# Altium PCB ASCII-v1.2.PcbDoc (part 1 of 4)
Units mil, origin at the board's own origin, x right, y up, seen from the top; angles counter-clockwise.
Board outline 1968.5 x 4921.26 mil, 4 copper layers (Top Layer, Layer 1, Layer 2, Bottom Layer), stack 62.45 mil thick; 189 components, 115 nets, 824 pads, 260 vias.
Unrouted connection lines stored in the file: 139.
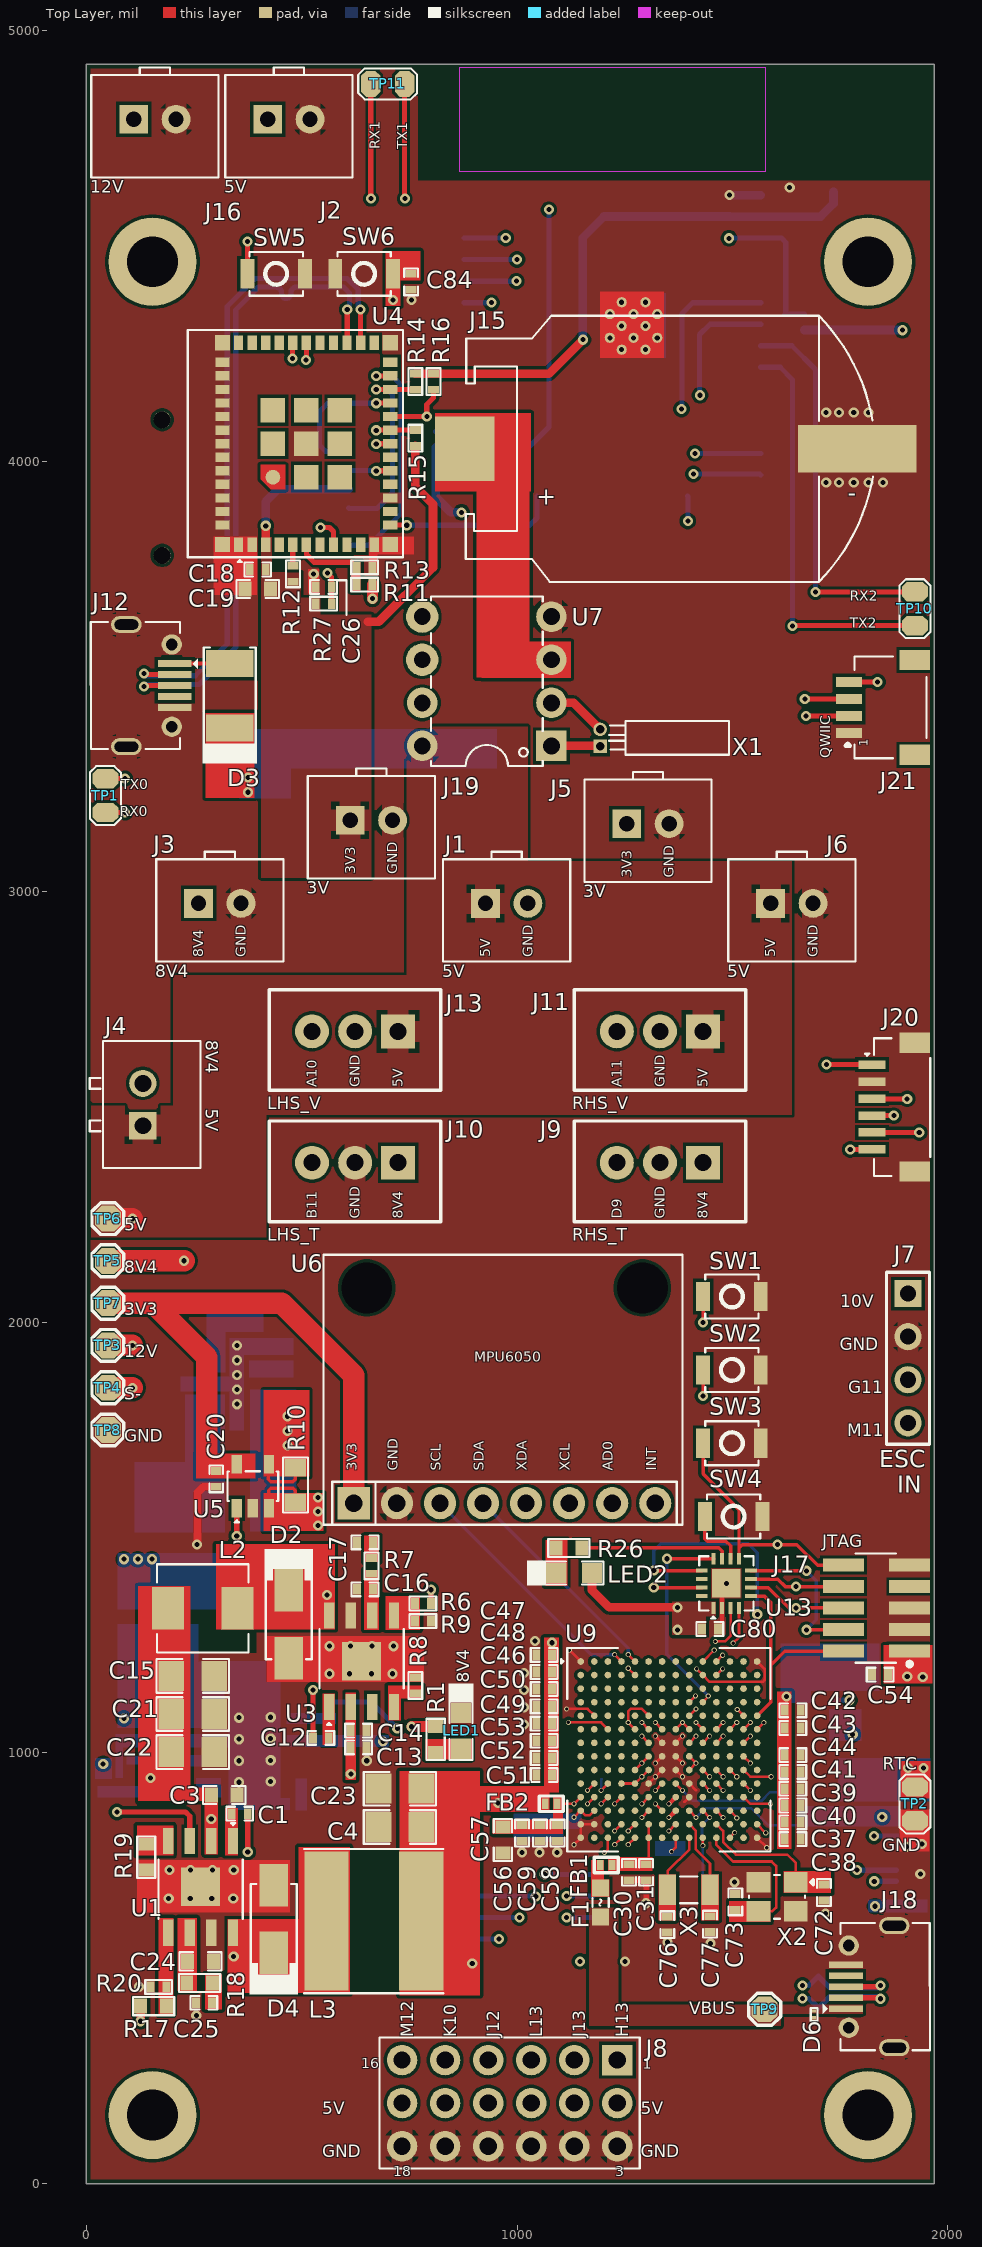
[diagram p0: Top Layer view]
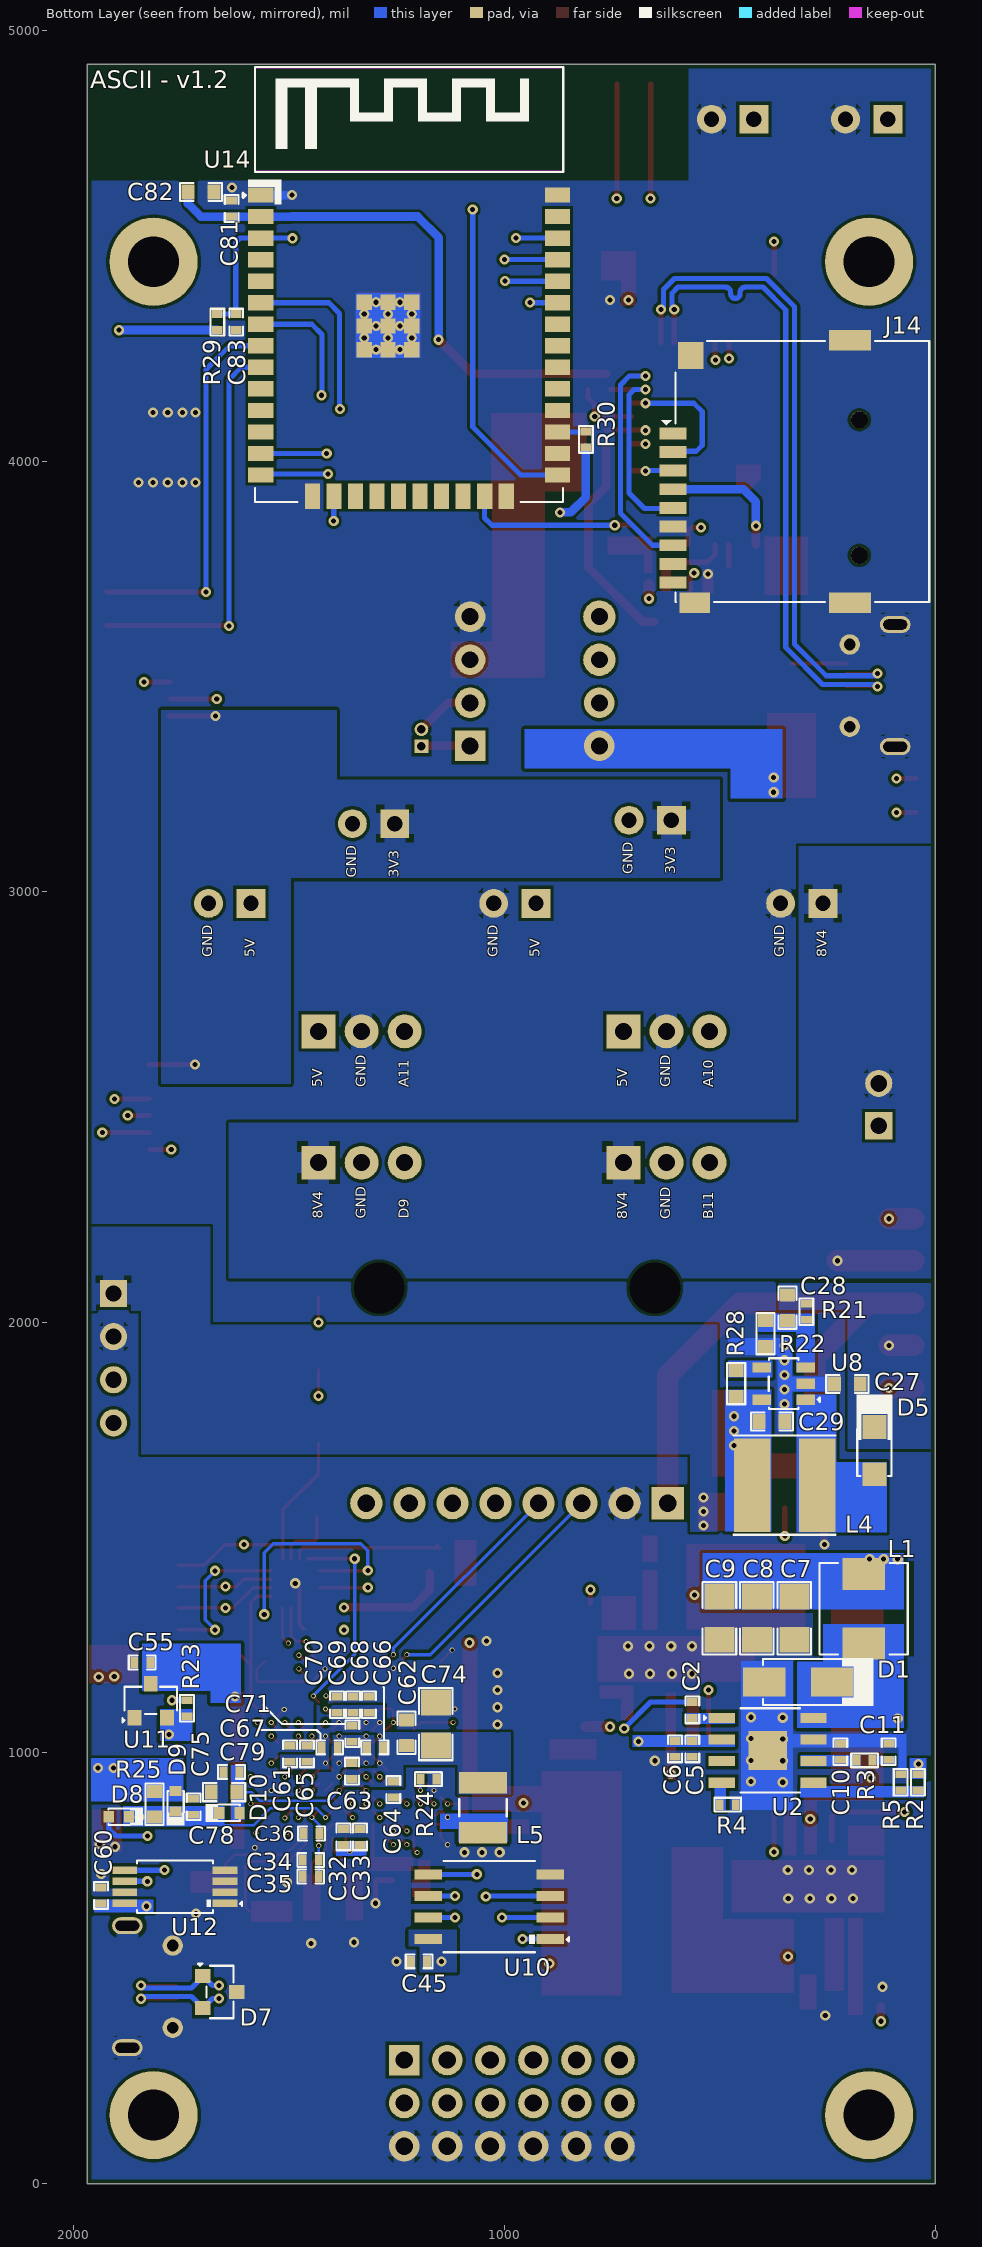
[diagram p1: Bottom Layer view, seen from below]
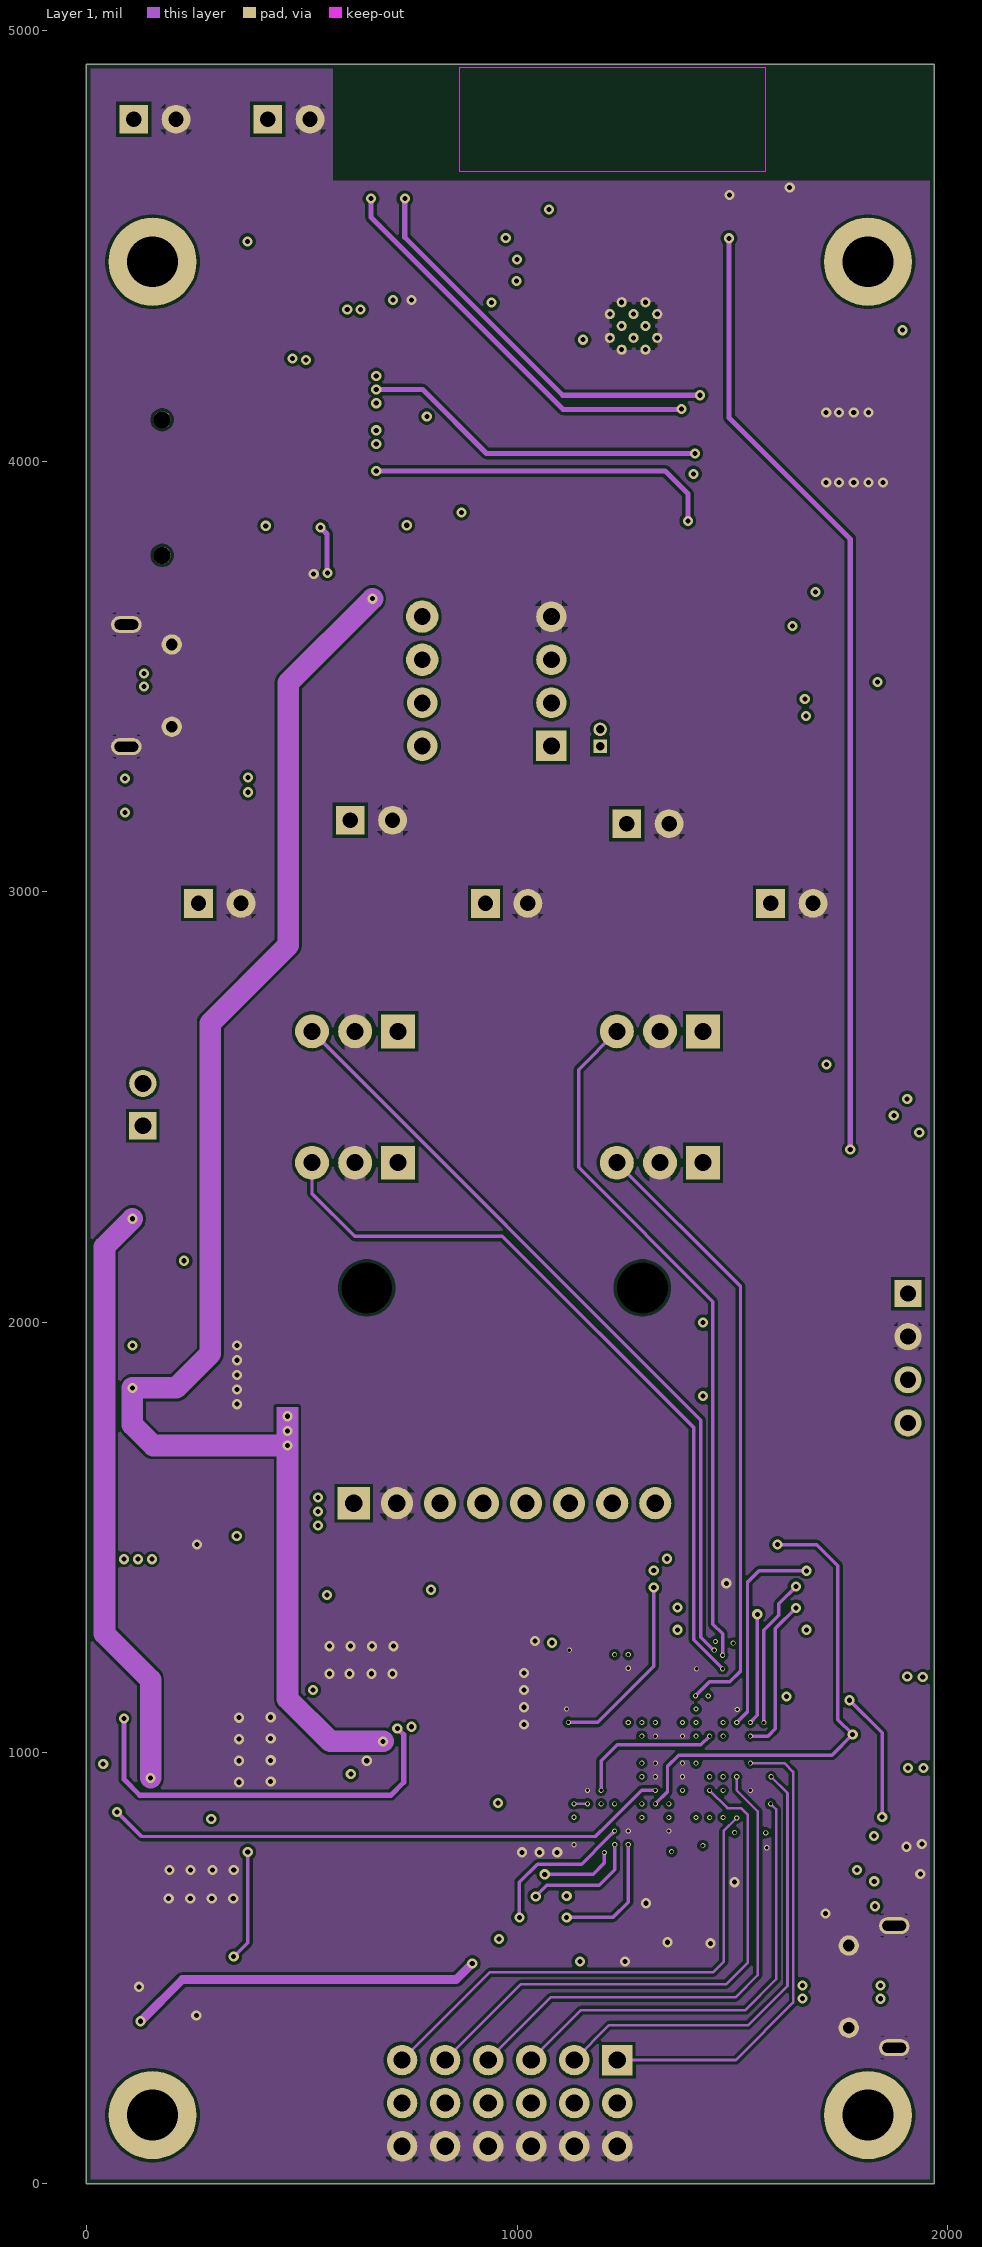
[diagram p2: Layer 1]
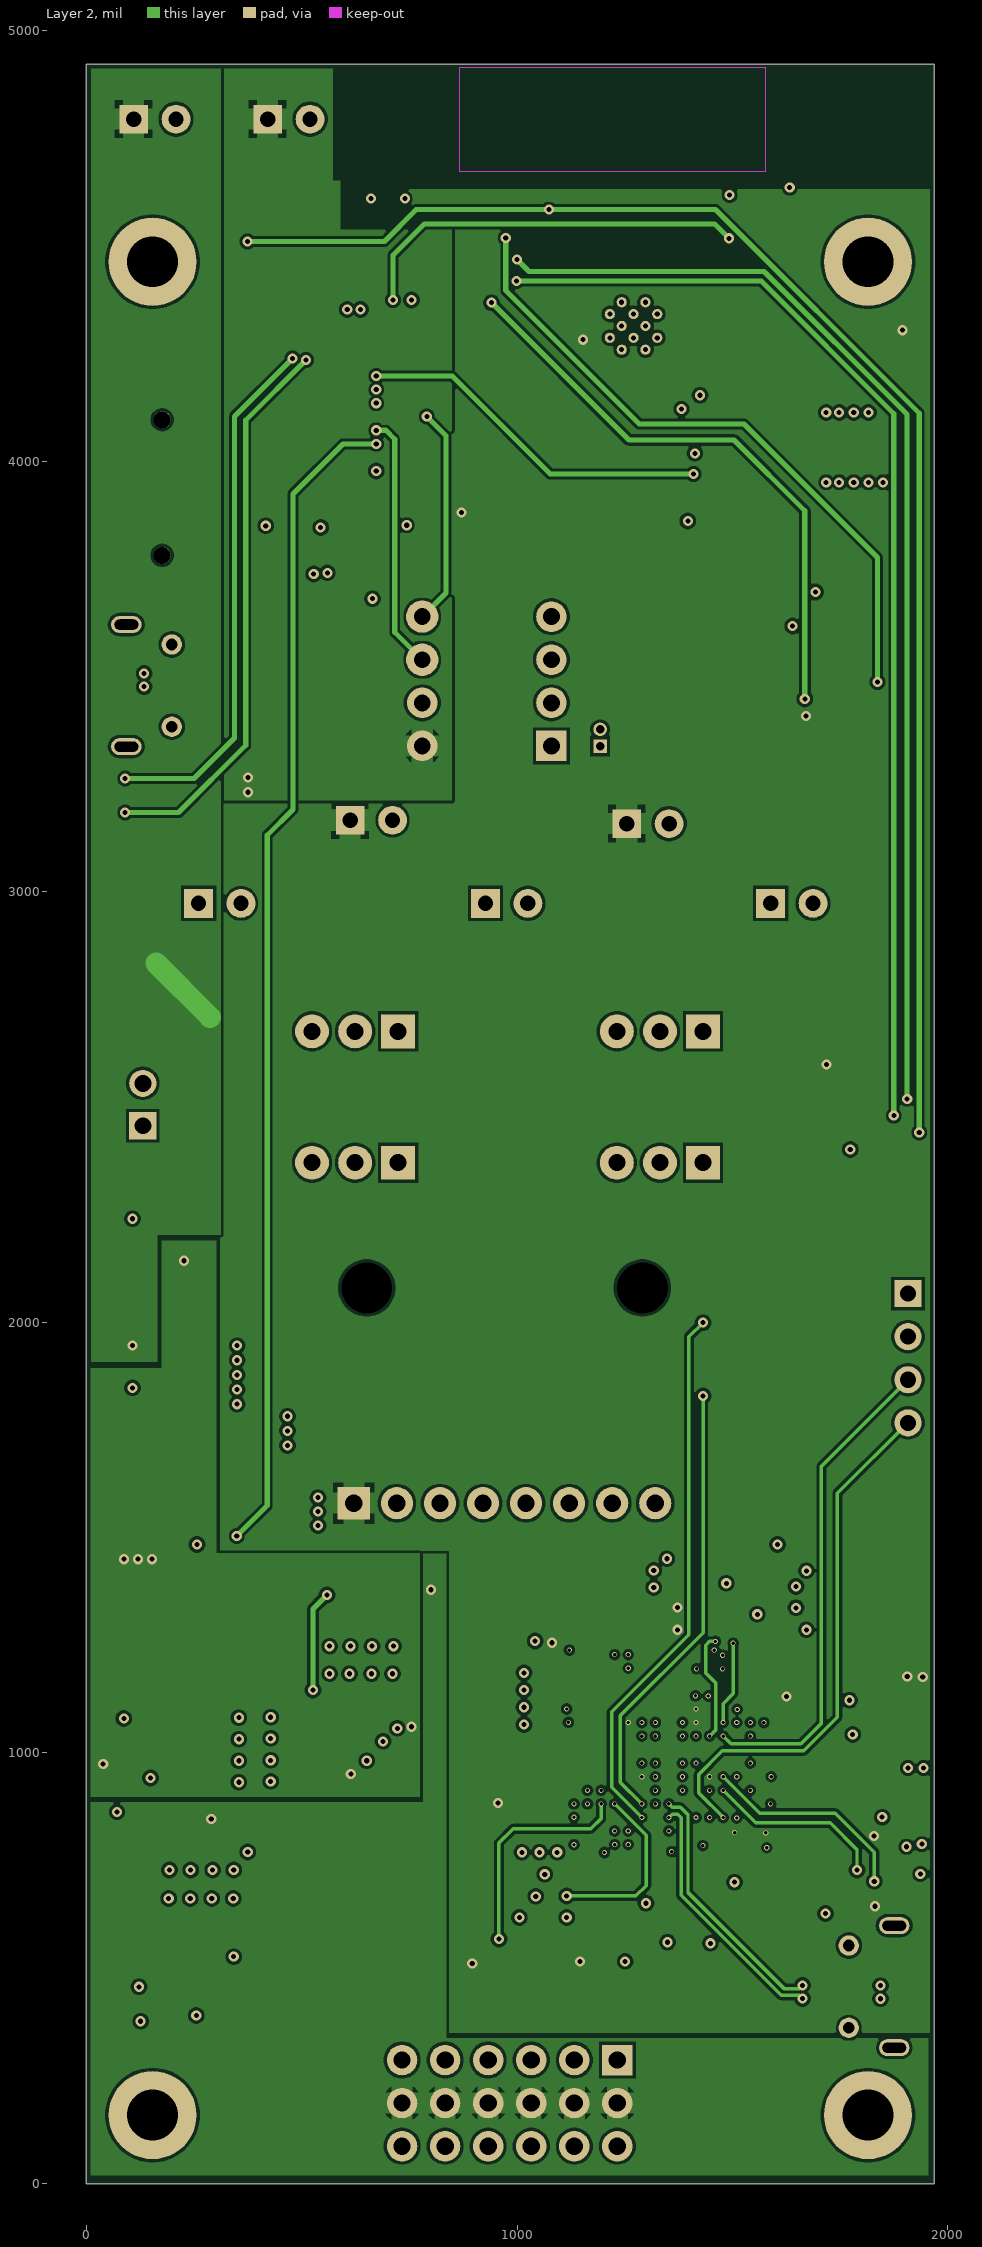
[diagram p3: Layer 2]
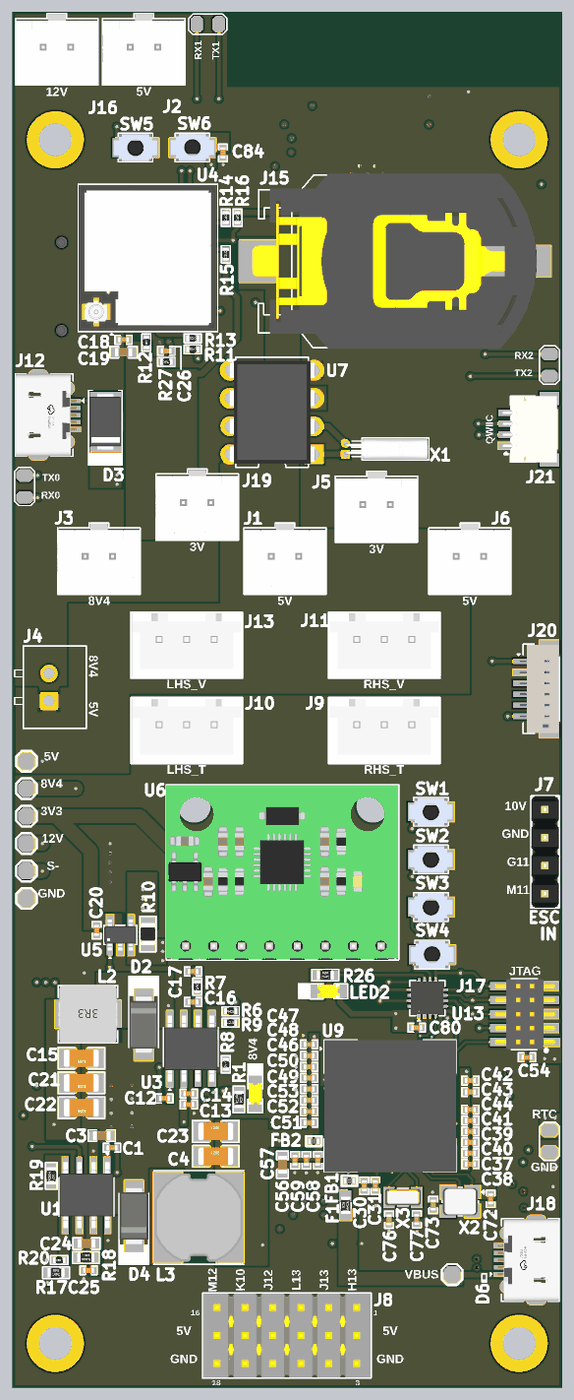
[diagram p5: 3D render of the assembled board from above, using the file's embedded part models]
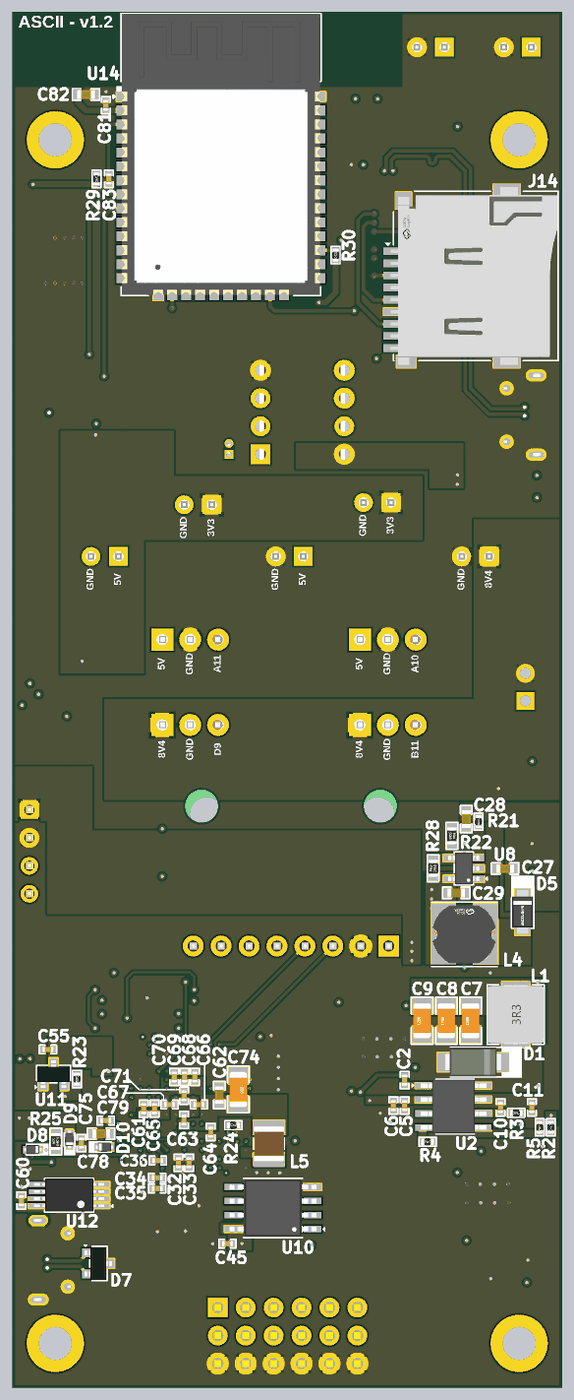
[diagram p6: 3D render of the assembled board from below, using the file's embedded part models]

## Layer stack, top to bottom
Top Solder: solder mask 0.394, Solder Resist, Dk 3.5
Top Layer: signal copper 1.38
Dielectric 2: prepreg 8.28, PP-006, Dk 4.1
Layer 1: signal copper 0.6
Dielectric 1: core 41.93, FR-4, Dk 4.8
Layer 2: signal copper 0.6
Dielectric 3: prepreg 8.28, PP-006, Dk 4.1
Bottom Layer: signal copper 1.38
Bottom Solder: solder mask 0.394, Solder Resist, Dk 3.5

## Board outline
0,0 0,4921.26 1968.5,4921.26 1968.5,0

## Design rules (kind name [scope] priority, off if disabled: settings)
BoardOutlineClearance [All] p1: gap=0 ignorepadtopadclearanceinfootprint=FALSE except(10: Poly-OutlineEdge)
Clearance [All] p1: gap=7 ignorepadtopadclearanceinfootprint=FALSE except(0: Arc-Hole Track-Hole SMDPad-Hole THPad-Hole Via-Hole Fill-Hole Poly-Hole Region-Hole Text-Hole; 4: Arc-SMDPad Track-SMDPad SMDPad-SMDPad)
DiffPairsRouting [InDifferentialPairClass('USB_PROGRAM_LINES')] p1: maxlimit=8 minlimit=8 mostfreqgap=8 toplayer_minwidth=12 toplayer_maxwidth=12 toplayer_prefwidth=12 midlayer1_minwidth=8 midlayer1_maxwidth=8 midlayer1_prefwidth=8 midlayer2_minwidth=8 midlayer2_maxwidth=8 midlayer2_prefwidth=8 bottomlayer_minwidth=12 bottomlayer_maxwidth=12 bottomlayer_prefwidth=12 impedanceprofiledriven=TRUE impedanceprofileid={82D3349C-C058-4513-A408-416EB23D566D} impedanceprofilevalue=90.000000 maxuncoupledlength=500
HoleSize [All] p1: absolutevalues=TRUE maxlimit=1000 minlimit=1 maxpercent=80.000 minpercent=20.000
HoleToHoleClearance [All] p1: gap=0 allowstackedmicrovias=TRUE
MatchedLengths "Schematic Matched Net Lengths" [InNetClass('USB_PROGRAM')] p1: tolerance=50 checknetsindiffpair=TRUE checkdiffpairvsdiffpair=FALSE checkxsignals=FALSE checkothers=FALSE
MaxMinImpedance "Schematic Impedance Constraint" [InNetClass('USB_PROGRAM')] p1: minimum=85.00 maximum=90.00
MinimumSolderMaskSliver [All] p1: minsoldermaskwidth=0
PolygonConnect [All] p1: thpad.connectstyle=Relief thpad.reliefconductorwidth=50 thpad.reliefentries=4 thpad.polygonreliefangle="90 Angle" thpad.airgapwidth=10 smdpad.connectstyle=Direct smdpad.reliefconductorwidth=50 smdpad.reliefentries=4 smdpad.polygonreliefangle="90 Angle" smdpad.airgapwidth=10 via.connectstyle=Direct via.reliefconductorwidth=50 via.reliefentries=4 via.polygonreliefangle="90 Angle" via.airgapwidth=10
RoutingVias [All] p1: holewidth=11.81 width=23.62 viastyle="Through Hole" minholewidth=7.87 minwidth=11.81 maxholewidth=11.81 maxwidth=23.62
SilkToSilkClearance [All] p1: silktosilkclearance=0
SilkToSolderMaskClearance [IsPad] p1: minsilkscreentomaskgap=0 clearancetoexposedcopper=TRUE
SolderMaskExpansion [All] p1: expansion=4 istentingtop=FALSE
UnRoutedNet [All] p1: checkbadconnections=TRUE
Width [All] p1: maxlimit=100 minlimit=6 preferedwidth=22
23 further rules are at their usual default settings.

## Classes and differential pairs
component class U_Teensy_4.1_Section: C30 C31 C32 C33 C34 C35 C36 C37 C38 C39 C40 C41 C42 C43 C44 C45 C46 C47 C48 C49 C50 C51 C52 C53 C54 C55 C56 C57 C58 C59 C60 C61 C62 C63 C64 C65 C66 C67 C68 C69 C70 C71 C72 C73 C74 C75 C76 C77 C78 C79 C80 D6 D7 D8 D9 D10 F1 FB1 FB2 J17 J18 L5 LED2 P7 R23 R24 R25 R26 SW1 SW2 SW3 SW4 TP2 TP9 U9 U10 U11 U12 U13 X2 X3
differential pair class USB_PROGRAM_LINES: USB1_D USB_D
net class USB_PROGRAM: USB1_D_N USB1_D_P USB_D_N USB_D_P
component class U_Power_Section: C1 C2 C3 C4 C5 C6 C7 C8 C9 C10 C11 C12 C13 C14 C15 C16 C17 C21 C22 C23 C24 C25 C27 C28 C29 D1 D2 D4 D5 J1 J2 J3 J4 J5 J6 J16 J19 L1 L2 L3 L4 LED1 R1 R2 R3 R4 R5 R6 R7 R8 R9 R17 R18 R19 R20 R21 R22 R28 TP3 TP4 TP5 TP6 TP7 TP8 U1 U2 U3 U8
component class U_Controller_Section: C18 C19 C20 C26 C81 C82 C83 C84 D3 J7 J8 J9 J10 J11 J12 J13 J14 J15 J20 J21 R10 R11 R12 R13 R14 R15 R16 R27 R29 R30 SW5 SW6 TP1 TP10 TP11 U4 U5 U6 U7 U14 X1
differential pair USB1_D: +USB1_D_P -USB1_D_N
differential pair USB_D: +USB_D_P -USB_D_N

## Components (designator, comment, footprint, x,y, rotation, side; value= is the part's Value field where it differs from the comment)
C1 "0.1uF" Cap-0402 356.11,859.12 r180 top
C2 "0.1uF" Cap-0402 564,1100 r270 bottom
C3 "10uF" Cap-0603 320.11,902.12 r180 top
C4 "47uF" Cap-1206 728.11,828.12 r0 top
C5 "4.7uF" Cap-0402 564,1009.5 r90 bottom
C6 "4.7uF" Cap-0402 604,1009.5 r90 bottom
C7 "47uF" Cap-1206 327,1313 r90 bottom
C8 "47uF" Cap-1206 414,1313 r90 bottom
C9 "47uF" Cap-1206 501,1313 r90 bottom
C10 "6.8pF" Cap-0402 220,1003 r270 bottom
C11 "5.6nF" Cap-0402 108,1003 r270 bottom
C12 "0.1uF" Cap-0402 544.5,1035 r0 top
C13 "4.7uF" Cap-0402 632,1013 r180 top
C14 "4.7uF" Cap-0402 632,1052 r180 top
C15 "47uF" Cap-1206 247,1179 r180 top
C16 "8.2pF" Cap-0402 647,1380 r0 top
C17 "1.8nF" Cap-0402 647,1489 r0 top
C18 "0.1uF" Cap-0402 397.88,3748.23 r180 top
C19 "10uF" Cap-0603 397.88,3703.23 r180 top
C20 "0.1uF" Cap-0402 301.5,1636.5 r90 top
C21 "47uF" Cap-1206 247,1090.5 r180 top
C22 "47uF" Cap-1206 247,1002 r180 top
C23 "47uF" Cap-1206 728.11,917.12 r0 top
C24 "18pF" Cap-0603 265.11,516.12 r180 top
C25 "1.8nF" Cap-0402 273,420 r0 top
C26 "1uF" Cap-0402 551,3708 r0 top
C27 "10uF" Cap-0603 204,1857 r180 bottom
C28 "470pF" Cap-0603 343,2034 r90 bottom
C29 "10uF" Cap-0603 379,1770 r0 bottom
C30 "1uF" Cap-0402 1260,723.02 r90 top
C31 "1uF" Cap-0402 1300,723.02 r90 top
C32 "4.7uF" Cap-0402 1374,805.02 r270 bottom
C33 "0.22uF" Cap-0402 1336,805.02 r270 bottom
C34 "4.7uF" Cap-0402 1450,751.01 r180 bottom
C35 "0.22uF" Cap-0402 1450,713.01 r180 bottom
C36 "0.22uF" Cap-0402 1448,813.01 r180 bottom
C37 "4.7uF" Cap-0402 1640.5,839.02 r180 top
C38 "0.22uF" Cap-0402 1640.5,800.02 r180 top
C39 "0.22uF" Cap-0402 1640.5,917.02 r180 top
C40 "1uF" Cap-0402 1640.5,878.02 r180 top
C41 "4.7uF" Cap-0402 1640.5,956.02 r180 top
C42 "100nF" cap-0402 1640.5,1099.02 r180 top
C43 "100nF" cap-0402 1640.5,1058.02 r180 top
C44 "100nF" cap-0402 1640.5,995.02 r180 top
C45 "100nF" cap-0402 1198.5,516 r180 bottom
C46 "4.7uF" Cap-0402 1063,1148.15 r0 top
C47 "100nF" cap-0402 1063,1228.01 r0 top
C48 "100nF" cap-0402 1063,1188.08 r0 top
C49 "4.7uF" Cap-0402 1063,1068.29 r0 top
C50 "100nF" cap-0402 1063,1108.22 r0 top
C51 "4.7uF" Cap-0402 1063,948.5 r0 top
C52 "100nF" cap-0402 1063,988.43 r0 top
C53 "0.22uF" Cap-0402 1063,1028.36 r0 top
C54 "100nF" cap-0402 1843,1182.01 r0 top
C55 "100nF" cap-0402 1841.5,1210.01 r180 bottom
C56 "4.7uF" Cap-0402 1012,814.02 r90 top
C57 "22uF" Cap-0603 967,798.02 r90 top
C58 "0.22uF" Cap-0402 1094,814.02 r90 top
C59 "0.22uF" Cap-0402 1053,814.02 r90 top
C60 "100nF" cap-0402 1936.82,669.33 r270 bottom
C61 "4.7uF" Cap-0402 1498,998.02 r270 bottom
C62 "22uF" Cap-0603 1227.5,1047.01 r270 bottom
C63 "0.22uF" Cap-0402 1354,958.02 r270 bottom
C64 "0.22uF" Cap-0402 1258,915.02 r90 bottom
C65 "0.22uF" Cap-0402 1459,998.02 r270 bottom
C66 "0.22uF" Cap-0402 1301,1013.02 r180 bottom
C67 "0.22uF" Cap-0402 1406,1013.02 r0 bottom
C68 "0.22uF" Cap-0402 1315,1112.02 r270 bottom
C69 "0.22uF" Cap-0402 1352,1112.02 r270 bottom
C70 "0.22uF" Cap-0402 1389,1112.02 r270 bottom
C71 "0.22uF" Cap-0402 1353.5,1044.51 r90 bottom
C72 "12pF" Cap-0402 1712.71,675.98 r270 top
C73 "12pF" Cap-0402 1507,654.05 r90 top
C74 "33uF" Cap-1206 1159.5,1067.01 r270 bottom
C75 "0.22uF" Cap-0402 1722,875.02 r270 bottom
C76 "12pF" Cap-0402 1349,601.52 r270 top
C77 "12pF" Cap-0402 1448.21,602.52 r270 top
C78 "10uF" Cap-0603 1651,909.02 r180 bottom
C79 "0.22uF" Cap-0402 1634,956.02 r180 bottom
C80 "100nF" cap-0402 1448,1288 r180 top
C81 "0.1uF" Cap-0402 1633.86,4586.61 r90 bottom
C82 "10uF" Cap-0603 1705,4625 r180 bottom
C83 "0.1uF" Cap-0402 1623,4323 r90 bottom
C84 "0.1uF" Cap-0402 754,4416.32 r90 top
D1 "SS56" SMA 318.26,1165 r0 bottom
D2 "SS56" SMA 470,1298.74 r270 top
D3 "SS34-MS" SMA(DO-214AC) 333,3455.2 r90 top
D4 "SS56" SMA 435.11,614.38 r90 top
D5 "PMEG3010ER,115" SOD-123W 141,1702.12 r90 bottom
D6 "PESD5V0H1BSFYL" DSN0603-2 1690,392.87 r90 top
D7 "ESD5302F-3/TR" Sot-23 1661,445 r270 bottom
D8 "RB521S30T1G" SOD-523 1895.62,852.02 r180 bottom
D9 "RB521S30T1G" SOD-523 1764,888.02 r270 bottom
D10 "RB521S30T1G" SOD-523 1638.93,861.02 r0 bottom
F1 "SMD0603-050" Fuse-0603 1194,652.55 r90 top
FB1 "BLM15PD121SN1D" IND-0402 1207,740.02 r0 top
FB2 "BLM15PD121SN1D" IND-0402 1079.22,882.02 r0 top
J1 "2.54-2P ZZDK" "2.54-2P ZZDK" 976,2973 r0 top
J2 "2.54-2P ZZDK" "2.54-2P ZZDK" 470.21,4794 r0 top
J3 "2.54-2P ZZDK" "2.54-2P ZZDK" 309.79,2973 r0 top
J4 "B2B-XH-2(LF)(SN)" B2B-XH-2(LF)(SN) 131,2505.79 r90 top
J5 "2.54-2P ZZDK" "2.54-2P ZZDK" 1304,3158 r0 top
J6 "2.54-2P ZZDK" "2.54-2P ZZDK" 1638.21,2973 r0 top
J7 "X6511WV-04H-C60D30" HDR1X4_ 1907.92,2066.7 r270 top
J8 "TSW-106-07-T-T" TSW-106-07-T-T 983,187 r180 top
J9 "B3B-XH-A(LF)(SN)" B3B-XH-A(LF)(SN)_ 1281.91,2370.7 r180 top
J10 "B3B-XH-A(LF)(SN)" B3B-XH-A(LF)(SN)_ 573.92,2370.7 r180 top
J11 "B3B-XH-A(LF)(SN)" B3B-XH-A(LF)(SN)_ 1281.91,2675.7 r180 top
J12 "HX MICRO XNJ JB" "HX MICRO XNJ JB" 149,3478.75 r270 top
J13 "B3B-XH-A(LF)(SN)" B3B-XH-A(LF)(SN)_ 573.92,2675.7 r180 top
J14 "HX TF-CARD H1.8" "HX TF-CARD H1.8" 392.54,3975.92 r90 bottom
J15 "BS-CR2032-8" BS-CR2032-8 1334.29,4028.69 r180 top
J16 "2.54-2P ZZDK" "2.54-2P ZZDK" 159,4794 r0 top
J17 "20021121-00010C4LF" 20021121-00010C4LF_ 1834.73,1336.51 r90 top
J18 "HX MICRO XNJ JB" "HX MICRO XNJ JB" 1819.8,457.27 r90 top
J19 "2.54-2P ZZDK" "2.54-2P ZZDK" 661.79,3166 r0 top
J20 "Voltlink Target" "Voltlink Target" 1874,2500 r270 top
J21 "SM04B-SRSS-TB(LF)(SN)" SM04B-SRSS-TB(LF)(SN) 1847,3428 r90 top
L1 "2.2uH" PSPMAA0503-2R2M-ANP 166,1335 r90 bottom
L2 "2.2uH" PSPMAA0503-2R2M-ANP 270.39,1336 r180 top
L3 "1uH" SRN8040-1R0Y 667.34,609.45 r0 top
L4 "12uH" SMTDR54-120M 349.21,1622 r180 bottom
L5 "4.7uH" IND-1210 1050,873.02 r270 bottom
LED1 "150080BS75000" LED-0805 870,1051.34 r90 top
LED2 "Orange" LED-0805 1132.66,1418 r180 top
R1 "270R" Res-0603 811,1031.34 r90 top
R2 "115K" Res-0402 40,932 r90 bottom
R3 "28.7K" Res-0402 164,983 r180 bottom
R4 "105K" Res-0402 481.5,880 r0 bottom
R5 "12.1k" Res-0402 80,932 r270 bottom
R6 "60.4K" Res-0402 781.5,1347 r0 top
R7 "23.7K" Res-0402 662,1434.5 r270 top
R8 "80.6K" Res-0402 764,1157 r270 top
R9 "11.5K" Res-0402 781.5,1306 r180 top
R10 "6mR" RES-0805 485.5,1622.5 r270 top
R11 "10K" Res-0402 645.88,3713.23 r180 top
R12 "10K" Res-0402 479.88,3738.23 r90 top
R13 "2K" Res-0402 645.88,3753.23 r180 top
R14 "10K" Res-0402 764,4184.5 r90 top
R15 "10K" Res-0402 764,4053.48 r270 top
R16 "10K" Res-0402 806,4184.5 r90 top
R17 "36.5K" Res-0603 156,412 r180 top
R18 "15.4K" Res-0603 263,466 r180 top
R19 "75K" Res-0603 139,758 r90 top value=75kR
R20 "11.5K" Res-0402 167.5,457 r0 top
R21 "118K" Res-0402 299,2024.5 r90 bottom
R22 "13.3K" Res-0603 394,1974 r90 bottom
R23 "100K" Res-0402 1737.5,1104.01 r270 bottom
R24 "100K" Res-0402 1176.77,939.02 r0 bottom
R25 "1K" Res-0603 1813,881.02 r270 bottom
R26 "130R" Res-0603 1120.66,1476 r180 top
R27 "10K" Res-0402 551,3669 r0 top
R28 "1M" Res-0603 462,1858 r270 bottom
R29 "10K" Res-0402 1667,4323 r90 bottom
R30 "10K" Res-0402 811,4050.5 r90 bottom
SW1 "B3U-1000P" B3U-1000P 1499,2060 r0 top
SW2 "B3U-1000P" B3U-1000P 1499,1889.67 r0 top
SW3 "B3U-1000P" B3U-1000P 1499,1719.33 r0 top
SW4 "B3U-1000P" B3U-1000P 1503,1549 r180 top
SW5 "B3U-1000P" B3U-1000P 440.74,4435 r0 top
SW6 "B3U-1000P" B3U-1000P 644.74,4435 r180 top
TP1 "2 Test Pad" "2 Test Pad" 44,3184 r90 top
TP2 "2 Test Pad" "2 Test Pad" 1924,921 r270 top
TP3 "TEST POINT" Test-point 50,1946.4 r0 top
TP4 "TEST POINT" Test-point 50,1848.2 r0 top
TP5 "TEST POINT" Test-point 50,2142.8 r0 top
TP6 "TEST POINT" Test-point 50,2241 r0 top
TP7 "TEST POINT" Test-point 50,2044.6 r0 top
TP8 "TEST POINT" Test-point 50,1750 r0 top
TP9 "TEST POINT" Test-point 1575,405 r0 top
TP10 "2 Test Pad" "2 Test Pad" 1924,3618 r90 top
TP11 "2 Test Pad" "2 Test Pad" 739,4876 r180 top
U1 "TPS54560DDAR" "8-SO PowerPad" 265.11,689.12 r270 top
U2 "TPS54560DDAR" "8-SO PowerPad" 389,1006 r180 bottom
U3 "TPS54560DDAR" "8-SO PowerPad" 639,1213 r90 top
U4 "ESP32-C3-MINI-1U-H4" ESP32-C3-MINI-1U-H4. 510.88,4040.48 r90 top
U5 "ZXCT1086E5TA" SOT-23-5 386.5,1619.5 r90 top
U6 "MPU6050 MODULE" MPU6050_ 971,1830 r0 top
U7 "DS1307N" 8-PDIP 929.89,3488.75 r180 top
U8 "LMR62014XMFX/NOPB" SOT-23-5 351.82,1857.6 r0 bottom
U9 "MIMXRT1062DVJ6B" "196-LFBGA (12x12)" 1352.75,1007.76 r0 top
U10 "W25Q64JVSSIM" "SOIC-8 (208 mil)" 1035.43,643.01 r0 bottom
U11 "UM803RS" SOT-23 1821.5,1121.64 r180 bottom
U12 "M24C64-FDW6TP" 8-TSSOP 1765.36,689.21 r0 bottom
U13 "MKL02Z32VFG4" "16-QFN (3x3)." 1486,1394 r90 top
U14 "ESP32-WROOM-32E-N4" "38-SMD Module" 1221.41,4268.21 r180 bottom
X1 "32.768KHz" DT-26 1192.89,3357.44 r180 top
X2 "24MHZ" X322524MOB4SI- 1604,666.02 r180 top
X3 "32.7680KHZ" NX3215SA-32.768K-STD-MUA-8_ 1399,682.02 r180 top

## Footprints (in the part's own frame and the unit in brackets; to place one, negate y for a bottom-side part, rotate by r counter-clockwise, add the part's x,y. Pads: shape width x height; smd on the part's side, far side on the other; paste and mask are expansions set on the pad)
"2 Test Pad" [mil]
  oct 45x60 smd: 1(0,0) 2(78.74,0)
  silkscreen extent -29,-36 108,36
"2.54-2P ZZDK" [mm]
  rect 1.7x1.7 hole 0.9 paste+0 mask+0.051: 1(-1.25,0)
  round 1.7 hole 0.9 paste+0 mask+0.051: 2(1.25,0)
  silkscreen extent -3.75,-3.43 3.75,3.05, body extent -3.75,-3.39 3.75,2.96, height 7
8-PDIP [mm]
  rect 1.8x1.8 hole 1 paste+0 mask+0.051: 1(-3.81,3.81)
  round 1.8 hole 1 paste+0 mask+0.051: 2(-3.81,1.27) 3(-3.81,-1.27) 4(-3.81,-3.81) 7(3.81,1.27) 8(3.81,3.81)
  round 1.905 hole 1 paste+0 mask+0.051: 5(3.81,-3.81) 6(3.81,-1.27)
  silkscreen extent -3.3,-5 3.3,5, body extent -3.92,-4.69 3.92,4.69, height 4.57
"8-SO PowerPad" [mm]
  rect 1.55x0.6 smd mask+0.07: 1(-2.7,1.905) 2(-2.7,0.635) 3(-2.7,-0.635) 4(-2.7,-1.905) 5(2.7,-1.905) 6(2.7,-0.635) 7(2.7,0.635) 8(2.7,1.905)
  rect 2.287x2.287 smd mask+0.07: 9(0,0)
  silkscreen extent -3.76,-2.49 1.9,2.49, body extent -3,-2.45 3,2.45, height 1.7
8-TSSOP [mm] "IC SENSOR THERMAL 3.0V 8TSSOP"
  rect 1.45x0.45 smd: 1(-2.95,0.975) 2(-2.95,0.325) 3(-2.95,-0.325) 4(-2.95,-0.975) 5(2.95,-0.975) 6(2.95,-0.325) 7(2.95,0.325) 8(2.95,0.975)
  silkscreen extent -3.96,-1.55 2.24,1.55, body extent -3.2,-1.5 3.2,1.5, height 1.2
"16-QFN (3x3)." [mm]
  rect 0.7x0.25 smd: 1(-1.45,0.75) 2(-1.45,0.25) 3(-1.45,-0.25) 4(-1.45,-0.75) 9(1.45,-0.75) 10(1.45,-0.25) 11(1.45,0.25) 12(1.45,0.75)
  rect 0.25x0.7 smd: 5(-0.75,-1.45) 6(-0.25,-1.45) 7(0.25,-1.45) 8(0.75,-1.45) 13(0.75,1.45) 14(0.25,1.45) 15(-0.25,1.45) 16(-0.75,1.45)
  rect 1.7x1.7 smd: 17(0,0)
  silkscreen extent -2.08,-1.6 1.6,1.6, body extent -1.55,-1.55 1.55,1.55, height 0.99
"38-SMD Module" [mm]
  rect 1.5x0.9 smd: 1(-8.75,8.88) 2(-8.75,7.61) 3(-8.75,6.34) 4(-8.75,5.07) 5(-8.75,3.8) 6(-8.75,2.53) 7(-8.75,1.26) 8(-8.75,-0.01) 9(-8.75,-1.28) 10(-8.75,-2.55) 11(-8.75,-3.82) 12(-8.75,-5.09) 13(-8.75,-6.36) 14(-8.75,-7.63) 25(8.75,-7.63) 26(8.75,-6.36) 27(8.75,-5.09) 28(8.75,-3.82) 29(8.75,-2.55) 30(8.75,-1.28) 31(8.75,-0.01) 32(8.75,1.26) 33(8.75,2.53) 34(8.75,3.8) 35(8.75,5.07) 36(8.75,6.34) 37(8.75,7.61) 38(8.75,8.88)
  rect 0.9x1.5 smd: 15(-5.71,-8.88) 16(-4.44,-8.88) 17(-3.17,-8.88) 18(-1.9,-8.88) 19(-0.63,-8.88) 20(0.64,-8.88) 21(1.91,-8.88) 22(3.18,-8.88) 23(4.45,-8.88) 24(5.72,-8.88)
  rect 0.9x0.9 smd: 39(-2.65,2.56) 40(-1.25,2.56) 41(0.15,2.56) 42(-2.65,1.16) 43(-1.25,1.16) 44(0.15,1.16) 45(-2.65,-0.24) 46(-1.25,-0.24) 47(0.15,-0.24)
  round 0.6 hole 0.3 mask+0: 39_10(-1.95,2.56) 39_11(-0.55,2.56) 39_12(-2.65,1.86) 39_13(-1.25,1.86) 39_14(0.15,1.86) 39_15(-1.95,1.16) 39_16(-0.55,1.16) 39_17(-2.65,0.46) 39_18(-1.25,0.46) 39_19(0.15,0.46) 39_20(-1.95,-0.24) 39_21(-0.55,-0.24)
  Keep-Out Layer region: -9.042,16.383 9.043,16.383 9.043,10.287 -9.042,10.287
  silkscreen extent -9.8,-9.22 9.09,16.43, body extent -9,-9.12 9,16.38, height 3.25
"196-LFBGA (12x12)" [mm]
  round 0.39 smd: A1(-5.2,5.2) A2(-4.4,5.2) A3(-3.6,5.2) A4(-2.8,5.2) A5(-2,5.2) A6(-1.2,5.2) A7(-0.4,5.2) A8(0.4,5.2) A9(1.2,5.2) A10(2,5.2) A11(2.8,5.2) A12(3.6,5.2) A13(4.4,5.2) A14(5.2,5.2) B1(-5.2,4.4) B2(-4.4,4.4) B3(-3.6,4.4) B4(-2.8,4.4) B5(-2,4.4) B6(-1.2,4.4) B7(-0.4,4.4) B8(0.4,4.4) B9(1.2,4.4) B10(2,4.4) B11(2.8,4.4) B12(3.6,4.4) B13(4.4,4.4) B14(5.2,4.4) C1(-5.2,3.6) C2(-4.4,3.6) C3(-3.6,3.6) C4(-2.8,3.6) C5(-2,3.6) C6(-1.2,3.6) C7(-0.4,3.6) C8(0.4,3.6) C9(1.2,3.6) C10(2,3.6) C11(2.8,3.6) C12(3.6,3.6) C13(4.4,3.6) C14(5.2,3.6) D1(-5.2,2.8) D2(-4.4,2.8) D3(-3.6,2.8) D4(-2.8,2.8) D5(-2,2.8) D6(-1.2,2.8) D7(-0.4,2.8) D8(0.4,2.8) D9(1.2,2.8) D10(2,2.8) D11(2.8,2.8) D12(3.6,2.8) D13(4.4,2.8) D14(5.2,2.8) E1(-5.2,2) E2(-4.4,2) E3(-3.6,2) E4(-2.8,2) E5(-2,2) E6(-1.2,2) E7(-0.4,2) E8(0.4,2) E9(1.2,2) E10(2,2) E11(2.8,2) E12(3.6,2) E13(4.4,2) E14(5.2,2) F1(-5.2,1.2) F2(-4.4,1.2) F3(-3.6,1.2) F4(-2.8,1.2) F5(-2,1.2) F6(-1.2,1.2) F7(-0.4,1.2) F8(0.4,1.2) F9(1.2,1.2) F10(2,1.2) F11(2.8,1.2) F12(3.6,1.2) F13(4.4,1.2) F14(5.2,1.2) G1(-5.2,0.4) G2(-4.4,0.4) G3(-3.6,0.4) G4(-2.8,0.4) G5(-2,0.4) G6(-1.2,0.4) G7(-0.4,0.4) G8(0.4,0.4) G9(1.2,0.4) G10(2,0.4) G11(2.8,0.4) G12(3.6,0.4) G13(4.4,0.4) G14(5.2,0.4) H1(-5.2,-0.4) H2(-4.4,-0.4) H3(-3.6,-0.4) H4(-2.8,-0.4) H5(-2,-0.4) H6(-1.2,-0.4) H7(-0.4,-0.4) H8(0.4,-0.4) H9(1.2,-0.4) H10(2,-0.4) H11(2.8,-0.4) H12(3.6,-0.4) H13(4.4,-0.4) H14(5.2,-0.4) J1(-5.2,-1.2) J2(-4.4,-1.2) J3(-3.6,-1.2) J4(-2.8,-1.2) J5(-2,-1.2) J6(-1.2,-1.2) J7(-0.4,-1.2) J8(0.4,-1.2) J9(1.2,-1.2) J10(2,-1.2) J11(2.8,-1.2) J12(3.6,-1.2) J13(4.4,-1.2) J14(5.2,-1.2) K1(-5.2,-2) K2(-4.4,-2) K3(-3.6,-2) K4(-2.8,-2) K5(-2,-2) K6(-1.2,-2) K7(-0.4,-2) K8(0.4,-2) K9(1.2,-2) K10(2,-2) K11(2.8,-2) K12(3.6,-2) K13(4.4,-2) K14(5.2,-2) L1(-5.2,-2.8) L2(-4.4,-2.8) L3(-3.6,-2.8) L4(-2.8,-2.8) L5(-2,-2.8) L6(-1.2,-2.8) L7(-0.4,-2.8) L8(0.4,-2.8) L9(1.2,-2.8) L10(2,-2.8) L11(2.8,-2.8) L12(3.6,-2.8) L13(4.4,-2.8) L14(5.2,-2.8) M1(-5.2,-3.6) M2(-4.4,-3.6) M3(-3.6,-3.6) M4(-2.8,-3.6) M5(-2,-3.6) M6(-1.2,-3.6) M7(-0.4,-3.6) M8(0.4,-3.6) M9(1.2,-3.6) M10(2,-3.6) M11(2.8,-3.6) M12(3.6,-3.6) M13(4.4,-3.6) M14(5.2,-3.6) N1(-5.2,-4.4) N2(-4.4,-4.4) N3(-3.6,-4.4) N4(-2.8,-4.4) N5(-2,-4.4) N6(-1.2,-4.4) N7(-0.4,-4.4) N8(0.4,-4.4) N9(1.2,-4.4) N10(2,-4.4) N11(2.8,-4.4) N12(3.6,-4.4) N13(4.4,-4.4) N14(5.2,-4.4) P1(-5.2,-5.2) P2(-4.4,-5.2) P3(-3.6,-5.2) P4(-2.8,-5.2) P5(-2,-5.2) P6(-1.2,-5.2) P7(-0.4,-5.2) P8(0.4,-5.2) P9(1.2,-5.2) P10(2,-5.2) P11(2.8,-5.2) P12(3.6,-5.2) P13(4.4,-5.2) P14(5.2,-5.2)
  silkscreen extent -6.35,-6 6,6, body extent -6,-6 6,6, height 1.58
20021121-00010C4LF_ [mm]
  rect 0.76x2.4 smd: 1(-2.54,-1.95) 2(-2.54,1.95) 3(-1.27,-1.95) 4(-1.27,1.95) 5(0,-1.95) 6(0,1.95) 7(1.27,-1.95) 8(1.27,1.95) 9(2.54,-1.95) 10(2.54,1.95)
  silkscreen extent -3.43,-2.08 3.23,1.22, body extent -3.17,-2.78 3.18,2.72, height 4.5
B2B-XH-2(LF)(SN) [mm]
  rect 1.6x1.6 hole 1 paste+0 mask+0.051: 1(-1.25,0)
  round 1.6 hole 1 paste+0 mask+0.051: 2(1.25,0)
  silkscreen extent -3.75,-3.4 3.74,3.13
B3B-XH-A(LF)(SN)_ [mm]
  rect 2x2 hole 1: 1(-3.81,0)
  round 2 hole 1: 2(-1.27,0) 3(1.27,0)
  silkscreen extent -6.32,-2.46 3.78,3.48, body extent -6.22,-2.36 3.68,3.39, height 7
B3U-1000P [mm] "SWITCH TACTILE SPST-NO 0.05A 12V"
  rect 0.82x1.72 smd: 1(-1.7,0) 2(1.7,0)
  silkscreen extent -1.57,-1.3 1.57,1.3, body extent -2,-1.26 2,1.24, height 1.6
BS-CR2032-8 [mm]
  rect 7x2.8 smd: 1(-11.575,0)
  rect 3.5x3.8 smd: 2(11.575,0)
  silkscreen extent -12.52,-7.85 11.52,7.85, body extent -13.83,-7.95 12.07,7.95, height 5.41
Cap-0402 [mil]
  rect 18x25 smd mask+2.36: 1(-18.5,0) 2(18.5,0)
  silkscreen extent -31,-16 31,16, body extent -20,-10 20,10, height 19
cap-0402 [mil]
  rect 18x25 smd mask+2.36: 1(-18.5,0) 2(18.5,0)
  silkscreen extent -31,-16 31,16, body extent -20,-10 20,10, height 19
Cap-0603 [mil]
  rect 30x35 smd mask+2.36: 1(-30,0) 2(30,0)
  silkscreen extent -49,-21 49,21, body extent -32,-16 31,16, height 34
Cap-1206 [mil] "SMD 1206"
  rect 60x70 smd: 1(-50,0) 2(50,0)
  silkscreen extent -84,-39 84,39, body extent -63,-31 63,32, height 39
DSN0603-2 [mm]
  rect 0.2x0.24 smd mask+0.055: 1(-0.2,0) 2(0.2,0)
  silkscreen extent -0.38,-0.2 0.38,0.2, body extent -0.3,-0.15 0.3,0.15, height 0.32
DT-26 [mm]
  rect 0.8x0.8 hole 0.5 paste+0 mask+0.051: 1(0,0.5)
  round 0.8 hole 0.5 paste+0 mask+0.051: 2(0,-0.5)
  silkscreen extent -7.6,-1 -0.54,1, body extent -7.51,-0.99 0.11,0.99, height 2.02
ESP32-C3-MINI-1U-H4. [mm]
  rect 0.85x0.55 smd paste+0 mask+0.05: 1(-5.95,4) 2(-5.95,3.2) 3(-5.95,2.4) 4(-5.95,1.6) 5(-5.95,0.8) 6(-5.95,0) 7(-5.95,-0.8) 8(-5.95,-1.6) 9(-5.95,-2.4) 10(-5.95,-3.2) 11(-5.95,-4) 25(5.95,-4) 26(5.95,-3.2) 27(5.95,-2.4) 28(5.95,-1.6) 29(5.95,-0.8) 30(5.95,0) 31(5.95,0.8) 32(5.95,1.6) 33(5.95,2.4) 34(5.95,3.2) 35(5.95,4)
  rect 0.55x0.85 smd paste+0 mask+0.05: 12(-4.8,-4.95) 13(-4,-4.95) 14(-3.2,-4.95) 15(-2.4,-4.95) 16(-1.6,-4.95) 17(-0.8,-4.95) 18(0,-4.95) 19(0.8,-4.95) 20(1.6,-4.95) 21(2.4,-4.95) 22(3.2,-4.95) 23(4,-4.95) 24(4.8,-4.95) 36(4.8,4.95) 37(4,4.95) 38(3.2,4.95) 39(2.4,4.95) 40(1.6,4.95) 41(0.8,4.95) 42(0,4.95) 43(-0.8,4.95) 44(-1.6,4.95) 45(-2.4,4.95) 46(-3.2,4.95) 47(-4,4.95) 48(-4.8,4.95)
  rect 1.45x1.45 smd paste+0 mask+0.05: 49(0,0) 54(-1.975,0) 56(0,1.975) 57(1.975,1.975) 58(1.975,0) 59(-1.975,-1.975) 60(0,-1.975) 61(1.975,-1.975)
  rect 0.9x0.9 smd paste+0 mask+0.05: 50(5.95,4.95) 51(5.95,-4.95) 52(-5.95,-4.95) 53(-5.95,4.95)
  round 0.87 smd: 55(-1.975,1.975)
  Top Layer region: -2.7,2.1 -2.1,2.7 -1.25,2.7 -1.25,1.25 -2.7,1.25 -2.7,2.1
  silkscreen extent -6.98,-5.7 6.7,7, body extent -6.6,-5.59 6.6,6.91, height 2.4
Fuse-0603 [mm]
  rect 1x1 smd: 1(-0.85,0) 2(0.85,0)
  silkscreen extent -0.25,-0.48 0.25,0.48, body extent -0.77,-0.42 0.78,0.43, height 0.45
HDR1X4_ [mm] "Connector; Header; 4 Position"
  rect 1.6x1.6 hole 0.95: 1(0,0)
  round 1.6 hole 0.95: 2(2.54,0) 3(5.08,0) 4(7.62,0)
  silkscreen extent -1.27,-1.27 8.89,1.27, body extent -1.27,-1.27 8.89,1.27, height 9.5
"HX MICRO XNJ JB" [mm]
  rect 0.4x2 smd paste-100 mask+0.05: 1(-1.3,1.428) 2(-0.65,1.428) 3(0,1.428) 4(0.65,1.428) 5(1.3,1.428)
  oval 1x1.8 hole 0.6 slot 1.4 at 90 deg paste+0 mask+0.05: S1(-3.6,-1.428) S2(3.6,-1.428)
  round 1.2 hole 0.7 paste+0 mask+0.05: S3(2.425,1.252) S4(-2.425,1.252)
  silkscreen extent -3.75,-3.53 3.75,2.79, body extent -3.75,-3.49 3.75,2.07, height 2.57
"HX TF-CARD H1.8" [mm]
  rect 0.7x1.6 smd paste+0 mask+0.05: 1(2.25,5.5) 2(1.15,5.5) 3(0.05,5.5) 4(-1.05,5.5) 5(-2.15,5.5) 6(-3.25,5.5) 7(-4.35,5.5) 8(-5.45,5.5) 9(-6.55,5.5)
  rect 1.2x1.8 smd paste+0 mask+0.05: MP1(-7.75,4.2)
  rect 1.2x2.5 smd paste+0 mask+0.05: MP2(-7.75,-4.95) MP3(7.75,-4.95)
  rect 1.6x1.5 smd paste+0 mask+0.05: MP4(6.85,4.45)
  round 1 hole 1 unplated paste+0: ""(-4.95,-5.5) ""(3.05,-5.5)
  silkscreen extent -7.7,-9.62 7.7,6.18, body extent -8.07,-9.56 8.08,5.64, height 2.06
IND-0402 [mm]
  rect 0.4x0.6 smd: 1(-0.35,0) 2(0.35,0)
  silkscreen extent -0.71,-0.46 0.71,0.46, body extent -0.5,-0.25 0.5,0.25, height 0.25
IND-1210 [mm]
  rect 1.27x2.81 smd: 1(-1.471,0) 2(1.471,0)
  silkscreen extent -0.52,-1.4 0.52,1.4, body extent -1.6,-1.4 1.6,1.4, height 2.5
LED-0805 [mm]
  rect 1.2x1.2 smd: 1(-1.05,0) 2(1.05,0)
  silkscreen extent -1.73,-0.74 2.79,0.74, body extent -1,-0.62 1,0.63, height 1.1
MPU6050_ [mm]
  rect 1.9x1.9 hole 1.021 paste+0 mask+0.102: 1(-8.89,-6.35)
  round 1.9 hole 1.021 paste+0 mask+0.102: 2(-6.35,-6.35) 3(-3.81,-6.35) 4(-1.27,-6.35) 5(1.27,-6.35) 6(3.81,-6.35) 7(6.35,-6.35) 8(8.89,-6.35)
  round 0 hole 3 unplated paste+0 mask+0.102: ""(-8.128,6.35) ""(8.128,6.35)
  silkscreen extent -10.67,-7.62 10.49,8.31, body extent -10.68,-7.62 10.43,8.25, height 8.94
NX3215SA-32.768K-STD-MUA-8_ [mm]
  rect 1x1.8 smd: 1(-1.25,0) 2(1.25,0)
  silkscreen extent -0.51,-0.79 0.51,0.79, body extent -1.6,-0.75 1.6,0.75, height 0.8
PSPMAA0503-2R2M-ANP [mm]
  rect 1.895x2.5 smd: 1(-2.047,0) 2(2.048,0)
  silkscreen extent -2.7,-2.6 2.7,2.6, body extent -2.7,-2.6 2.7,2.6, height 3.1
Res-0402 [mil]
  rect 18x25 smd mask+2.17: 1(-18.5,0) 2(18.5,0)
  silkscreen extent -32,-17 32,16, body extent -23,-11 23,11, height 16
Res-0603 [mil]
  rect 30x35 smd: 1(-30,0) 2(30,0)
  silkscreen extent -48,-21 48,21, body extent -31,-17 31,17, height 18
RES-0805 [mil] "SMD 0805"
  rect 40x50 smd: 1(-40,0) 2(40,0)
  silkscreen extent -64,-29 64,29, body extent -39,-25 39,24, height 24
SM04B-SRSS-TB(LF)(SN) [mm]
  rect 0.6x1.55 smd: 1(-1.5,1.938) 2(-0.5,1.938) 3(0.5,1.938) 4(1.5,1.938)
  rect 1.2x1.8 smd: MP1(-2.8,-1.937) MP2(2.8,-1.937)
  silkscreen extent -3,-2.64 3,2.13, body extent -3,-2.63 3,2.32, height 2.96
SMA [mm]
  rect 2.5x1.7 smd: 1(-2,0) 2(2,0)
  silkscreen extent -4.44,-1.42 2.06,1.42, body extent -2.6,-1.3 2.6,1.3, height 2.4
SMA(DO-214AC) [mm]
  rect 1.6x2.8 smd: 1(-1.9,0) 2(1.9,0)
  silkscreen extent -3.99,-1.6 2.84,1.6, body extent -2.6,-1.45 2.6,1.45, height 2.3
SMTDR54-120M [mm]
  rect 2.15x5.5 smd: 1(-1.925,0) 2(1.925,0)
  silkscreen extent -3.03,-2.93 2.97,2.93, body extent -2.92,-2.65 2.87,2.65, height 4.62
SOD-123W [mm] "DIODE SCHOTTKY 30V 1A SOD123W"
  rect 1.4x1.4 smd: 1(-1.4,0) 2(1.4,0)
  silkscreen extent -1.5,-1.07 3.3,1.07, body extent -2,-0.95 2,0.95, height 1.1
SOD-523 [mm] "SOD-523 Schottky Barrier Diodes (SBD) ROHS"
  rect 0.6x0.7 smd: 1(-0.6,0) 2(0.6,0)
  silkscreen extent -0.61,-0.53 1.42,0.53, body extent -0.8,-0.4 0.8,0.4, height 0.7
"SOIC-8 (208 mil)" [mm]
  rect 1.61x0.58 smd: 1(-3.605,1.905) 2(-3.605,0.635) 3(-3.605,-0.635) 4(-3.605,-1.905) 5(3.605,-1.905) 6(3.605,-0.635) 7(3.605,0.635) 8(3.605,1.905)
  silkscreen extent -4.7,-2.69 2.69,2.69, body extent -3.95,-2.64 3.95,2.64, height 2.16
Sot-23 [mm] "TRANS NPN 40V 0.6A SOT23"
  rect 0.82x0.92 smd: 1(-0.95,-1) 2(0.95,-1) 3(0,1)
  silkscreen extent -1.68,-1.3 1.55,0.81, body extent -1.5,-1.25 1.5,1.25, height 1.05
SOT-23 [mm] "TRANS NPN 40V 0.6A SOT23"
  rect 0.82x0.92 smd: 1(-0.95,-1) 2(0.95,-1) 3(0,1)
  silkscreen extent -1.68,-1.3 1.55,0.81, body extent -1.5,-1.25 1.5,1.25, height 1.05
SOT-23-5 [mm]
  rect 1.1x0.6 smd: 1(-1.3,0.95) 2(-1.3,0) 3(-1.3,-0.95) 4(1.3,-0.95) 5(1.3,0.95)
  silkscreen extent -2.13,-1.5 0.88,1.5, body extent -1.4,-1.45 1.4,1.45, height 1.45
SRN8040-1R0Y [mm]
  rect 2.6x8.2 smd: 1(-2.8,0) 2(2.8,0)
  silkscreen extent -4.1,-4.26 4.1,4.26, body extent -4,-4 4,4, height 4
Test-point [mil]
  oct 60x60 smd: 1(0,0)
  silkscreen extent -37,-37 37,37
TSW-106-07-T-T [mm]
  rect 1.8x1.8 hole 1.02: 1(-6.35,-2.54)
  round 1.8 hole 1.02: 2(-6.35,0) 3(-6.35,2.54) 4(-3.81,-2.54) 5(-3.81,0) 6(-3.81,2.54) 7(-1.27,-2.54) 8(-1.27,0) 9(-1.27,2.54) 10(1.27,-2.54) 11(1.27,0) 12(1.27,2.54) 13(3.81,-2.54) 14(3.81,0) 15(3.81,2.54) 16(6.35,-2.54) 17(6.35,0) 18(6.35,2.54)
  silkscreen extent -7.67,-3.86 7.67,3.86, body extent -7.62,-3.81 7.62,3.81, height 8.38
"Voltlink Target" [mm]
  rect 0.5x1.6 smd: 1(-2.5,-1.262) 2(-1.5,-1.262) 3(-0.5,-1.262) 4(0.5,-1.262) 5(1.5,-1.262) 6(2.5,-1.262)
  rect 1.2x1.8 smd: MP1(-3.8,1.262) MP2(3.8,1.262)
  silkscreen extent -4.06,-1.68 4.06,2.17, body extent -4,-1.49 4,2.11, height 4.25
X322524MOB4SI- [mm]
  rect 1.4x1.2 smd: 1(-1.1,-0.85) 2(1.1,-0.85) 3(1.1,0.85) 4(-1.1,0.85)
  silkscreen extent -2.13,-1.3 1.65,1.3, body extent -1.6,-1.25 1.6,1.25, height 0.8

## Part data
C1 C2 C12 C18 C20 C81 C83 C84: library part CC0402KRX7R8BB104, "CAP CER 0.1UF 25V X7R 0402", Capacitance=100nF, Case Code (Imperial)=0402, Case Code (Metric)=1005, Dielectric=X7R, LCSC Part Number=C105883, Manufacturer=Yageo, Max Operating Temperature=125°C, Min Operating Temperature=-55°C, Resistor Type=Ceramic, Supplier Part Number 1=311-2077-1-ND, Tolerance=10%, Voltage Rating=25V, Case/Package=0402, Category="Ceramic Capacitors", ComponentLink1Description=https://datasheet.ciiva.com/11464/upy-gphc-x7r-6-3v-to-50v-8-11464889.pdf?src-supplier=Avnet, ComponentLink1URL=https://datasheet.ciiva.com/11464/upy-gphc-x7r-6-3v-to-50v-8-11464889.pdf?src-supplier=Avnet, ComponentLink2Description=https://datasheet.ciiva.com/13210/upy-gphc-x7r-6-3v-to-50v-8-12304-13210908.pdf?src-supplier=Mouser, ComponentLink2URL=https://datasheet.ciiva.com/13210/upy-gphc-x7r-6-3v-to-50v-8-12304-13210908.pdf?src-supplier=Mouser, ComponentLink3Description=https://datasheet.ciiva.com/17437/upy-gphc-x7r-6-3v-to-50v-8-17437357.pdf?src-supplier=Avnet+Europe, ComponentLink3URL=https://datasheet.ciiva.com/17437/upy-gphc-x7r-6-3v-to-50v-8-17437357.pdf?src-supplier=Avnet+Europe, Depth=0.5mm, Dissipation Factor=3.5%, Halogen Free="Halogen Free", Height=0.5mm, Lead Free="Lead Free", Length=1mm, Manufacturer Part Number=CC0402KRX7R8BB104, Mount="Surface Mount", Packaging="Tape and Reel", Pricing 1="1=0.10000, 10=0.03100, 50=0.01700, 100=0.01390, 500=0.00990, 1000=0.00777, 2500=0.00707, 5000=0.00650 (USD)", Radiation Hardening=No, RoHS=Yes, Stock 1=1841009, Supplier 1=Digi-Key, Termination=SMD/SMT, Thickness=0.022inch, Voltage Rating (DC)=25V, Width=0.02inch
C3 C19 C27 C29 C78 C82: library part CL10A106MA8NRNC, "CAP CER 10UF 25V X5R 0603", Case Code (Imperial)=0603, Case Code (Metric)=1608, Dielectric=X5R, LCSC Part Number=C96446, Manufacturer=Samsung, Max Operating Temperature=85°C, Min Operating Temperature=-55°C, Package Quantity=1, Tolerance=20%, Voltage Rating=25V, Capacitance=10uF, Case/Package=0603, Category="Ceramic Capacitors", ComponentLink1Description=https://datasheet.ciiva.com/25766/cl10a106ma8nrnc-25766562.pdf?src-supplier=Digi-Key, ComponentLink1URL=https://datasheet.ciiva.com/25766/cl10a106ma8nrnc-25766562.pdf?src-supplier=Digi-Key, Construction=Flat, Contact Plating=Tin, Lead Free="Lead Free", Length=0.063inch, Manufacturer Part Number=CL10A106MA8NRNC, Mount="Surface Mount", Packaging="Tape and Reel", Pricing 1="4000=0.03753, 8000=0.03700, 16000=0.03595, 24000=0.03515, 32000=0.03383, 40000=0.03304, 400000=0.03225 (USD)", RoHS=Yes, RoHS Compliant=Yes, Series=CL, Supplier 1=Avnet, Supplier Part Number 1=CL10A106MA8NRNC, Termination=Wraparound, Thickness=0.035inch, Width=0.031inch
C4 C7 C8 C9 C15 C21 C22 C23: library part GRM31CR61E476ME44L, "CAP CER 47UF 25V X5R 1206", Dielectric=X5R, LCSC Part Number=C403725, Manufacturer=Murata, Supplier Part Number 1=490-16268-2-ND, Tolerance=20%, Voltage Rating (DC)=25V, Capacitance=47uF, Category="Ceramic Capacitors", ComponentLink1Description=https://search.murata.co.jp/Ceramy/image/img/A01X/partnumbering_e_01.pdf?src-supplier=Digi-Key, ComponentLink1URL=https://search.murata.co.jp/Ceramy/image/img/A01X/partnumbering_e_01.pdf?src-supplier=Digi-Key, Item Type=Capacitor, Length=3.2mm, Manufacturer Part Number=GRM31CR61E476ME44L, RoHS=Yes, Supplier 1=Digi-Key, Thickness=1.6mm, Width=1.6mm
C5 C6 C13 C14 C32 C34 C37 C41 C46 C49 C51 C56 C61: library part CGA0402X5R475M250GT, "25V 4.7uF X5R ±20% 0402 Multilayer Ceramic Capacitors MLCC - SMD/SMT ROHS", LCSC Part Number=C6119795, Manufacturer=HRE, ComponentLink1Description=LCSC, ComponentLink1URL=https://www.lcsc.com/product-detail/Multilayer-Ceramic-Capacitors-MLCC-SMD-SMT_HRE-CGA0402X5R475M250GT_C6119795.html, Item Type=Capacitor, Manufacturer Part Number=CGA0402X5R475M250GT
C10: library part CC0402CRNPO9BN6R8, "CAP CER 6.8PF 50V C0G/NPO 0402", Case Code (Imperial)=0402, Case Code (Metric)=1005, Dielectric=C0G, Insulation Resistance=10GR, LCSC Part Number=C189470, Manufacturer=Yageo, Max Operating Temperature=125°C, Min Operating Temperature=-55°C, Supplier Part Number=3247368, Tolerance=2%, Voltage Rating=50V, Case/Package=0402, Category="Ceramic Capacitors", ComponentLink1Description=https://datasheet.ciiva.com/11587/upy-gp-np0-16v-to-50v-8-11587182.pdf?src-supplier=Avnet, ComponentLink1URL=https://datasheet.ciiva.com/11587/upy-gp-np0-16v-to-50v-8-11587182.pdf?src-supplier=Avnet, Construction=Flat, Depth=0.5mm, Height=0.5mm, Item Type=Capacitor, Length=1mm, Manufacturer Part Number=CC0402CRNPO9BN6R8, Mounting Technology="Surface Mount", Packaging="Tape and Reel", Pricing="10000=0.0024, 40000=0.0022, 150000=0.0021, 400000=0.002, 1000000=0.0019 (USD)", Radiation Hardening=No, RoHS=Yes, RoHS Compliant=Yes, Series=CC, Stock=200000, Supplier="Future Electronics", Termination=SMD/SMT, Voltage Rating (DC)=50V, Weight=2.3E-05oz, Width=0.5mm
C11: library part CC0402KRX7R9BB562, "CAP CER 5600PF 50V X7R 0402", LCSC Part Number=C281760, Manufacturer=Yageo, Temperature Coefficient=30ppm/°C, ComponentLink1Description=https://datasheet.ciiva.com/26862/getdatasheetpartid-403477-26862651.pdf?src-supplier=Verical, ComponentLink1URL=https://datasheet.ciiva.com/26862/getdatasheetpartid-403477-26862651.pdf?src-supplier=Verical, ComponentLink2Description=https://datasheet.ciiva.com/11586/upy-gphc-x7r-6-3v-to-50v-8-11586494.pdf?src-supplier=Avnet, ComponentLink2URL=https://datasheet.ciiva.com/11586/upy-gphc-x7r-6-3v-to-50v-8-11586494.pdf?src-supplier=Avnet, Halogen Free=5694HalogenFree, Height=550um, Item Type=Capacitors, Lead Free=5697LeadFree, Manufacturer Part Number=CC0402KRX7R9BB562, Material=4241ConductorMaterial, Pricing="10000=0.0029, 40000=0.0028, 150000=0.0027, 300000=0.0026, 750000=0.0025 (USD)", RoHS=Yes, Stock=120000, Supplier="Future Electronics"
C16: library part CC0402DRNPO9BN8R2, "CAP CER 8.2PF 50V C0G/NPO 0402", LCSC Part Number=C327412, Manufacturer=Yageo, Supplier Part Number=2138063, Category="Ceramic Capacitors", ComponentLink1Description=https://datasheet.ciiva.com/144/mlccorderingcode-144589.pdf?src-supplier=Digikey, ComponentLink1URL=https://datasheet.ciiva.com/144/mlccorderingcode-144589.pdf?src-supplier=Digikey, ComponentLink2Description=https://datasheet.ciiva.com/144/mlccorderingcode-144590.pdf?src-supplier=Digikey, ComponentLink2URL=https://datasheet.ciiva.com/144/mlccorderingcode-144590.pdf?src-supplier=Digikey, ComponentLink3Description=https://datasheet.ciiva.com/144/mlccorderingcode-144591.pdf?src-supplier=Digikey, ComponentLink3URL=https://datasheet.ciiva.com/144/mlccorderingcode-144591.pdf?src-supplier=Digikey, ComponentLink4Description=https://datasheet.ciiva.com/13208/upy-gp-np0-16v-to-50v-8-13208987.pdf?src-supplier=Mouser, ComponentLink4URL=https://datasheet.ciiva.com/13208/upy-gp-np0-16v-to-50v-8-13208987.pdf?src-supplier=Mouser, ComponentLink5Description=https://datasheet.ciiva.com/11587/upy-gp-np0-16v-to-50v-8-11587051.pdf?src-supplier=Avnet, ComponentLink5URL=https://datasheet.ciiva.com/11587/upy-gp-np0-16v-to-50v-8-11587051.pdf?src-supplier=Avnet, Item Type=Capacitor, Manufacturer Part Number=CC0402DRNPO9BN8R2, Pricing="10000=0.0024, 40000=0.0022, 150000=0.0021, 400000=0.002, 1000000=0.0019 (USD)", RoHS=Yes, Stock=120000, Supplier="Future Electronics"
C17 C25: library part CC0402KRX7R9BB182, "50V 1.8nF X7R ±10% 0402 Multilayer Ceramic Capacitors MLCC - SMD/SMT ROHS", LCSC Part Number=C107024, Manufacturer=YAGEO, Package=0402, ComponentLink1Description=LCSC, ComponentLink1URL=https://www.lcsc.com/product-detail/Multilayer-Ceramic-Capacitors-MLCC-SMD-SMT_YAGEO-CC0402KRX7R9BB182_C107024.html, Item Type=Capacitor, Manufacturer Part Number=CC0402KRX7R9BB182
C24: library part CL10C180JB8NNNC, "CAP CER 18PF 50V C0G/NP0 0603", Case Code (Imperial)=0603, Case Code (Metric)=1608, Dielectric=C0G, Manufacturer=Samsung, Max Operating Temperature=125°C, Min Operating Temperature=-55°C, Temperature Coefficient=300ppm/°C, Tolerance=5%, Voltage=50V, Capacitance=18pF, Case/Package=0603, Category="Ceramic Capacitors", ComponentLink1Description=https://datasheet.ciiva.com/25709/cl10c180jb8nnnc-25709670.pdf?src-supplier=Digi-Key, ComponentLink1URL=https://datasheet.ciiva.com/25709/cl10c180jb8nnnc-25709670.pdf?src-supplier=Digi-Key, ComponentLink2Description=https://datasheet.ciiva.com/26838/getdatasheetpartid-660083-26838496.pdf?src-supplier=Verical, ComponentLink2URL=https://datasheet.ciiva.com/26838/getdatasheetpartid-660083-26838496.pdf?src-supplier=Verical, ComponentLink3Description=https://datasheet.ciiva.com/29198/457219-da-01-en-vs-kondensator-0603-29198763.pdf?src-supplier=Conrad, ComponentLink3URL=https://datasheet.ciiva.com/29198/457219-da-01-en-vs-kondensator-0603-29198763.pdf?src-supplier=Conrad, ComponentLink4Description=https://datasheet.ciiva.com/26310/mlcc-catalogdownload2013-eng-26310310.pdf?src-supplier=Distrelec, ComponentLink4URL=https://datasheet.ciiva.com/26310/mlcc-catalogdownload2013-eng-26310310.pdf?src-supplier=Distrelec, Construction=Flat, Contact Plating=Tin, Depth=0.8mm, Height=0.8mm, Length=1.6mm, Manufacturer Part Number=CL10C180JB8NNNC, Material=Ceramic, Mount="Surface Mount", Packaging="Tape and Reel", Pricing 1="4000=0.00360, 8000=0.00210 (USD)", Radiation Hardening=No, RoHS=Yes, RoHS Compliant=Yes, Series=CL, Stock 1=1828000, Supplier 1="Arrow Electronics", Supplier Part Number 1=CL10C180JB8NNNC, Thickness=0.035inch, Voltage Rating=50V, Width=0.031inch
C26 C30 C31 C40: library part CC0402KRX5R7BB105, "CAP CER 1UF 16V X5R 0402", Case Code (Imperial)=0402, Case Code (Metric)=1005, Dielectric=X5R, LCSC Part Number=C325464, Manufacturer=Yageo, Max Operating Temperature=85°C, Min Operating Temperature=-55°C, Supplier Part Number 1=311-1691-6-ND, Tolerance=10%, Voltage Rating=16V, Capacitance=1uF, Case/Package=0402, ComponentLink1Description=http://www.yageo.com/documents/recent/UPY-GPHC_X5R_4V-to-50V_12.pdf?src-supplier=Avnet+Europe, ComponentLink1URL=http://www.yageo.com/documents/recent/UPY-GPHC_X5R_4V-to-50V_12.pdf?src-supplier=Avnet+Europe, Composition=Ceramic, Depth=0.5mm, Halogen Free="Halogen Free", Height=0.5mm, Item Type=Capacitor, Lead Free="Lead Free", Length=1mm, Manufacturer Part Number=CC0402KRX5R7BB105, Mount="Surface Mount", Packaging="Tape and Reel", Pricing 1="1=0.36, 10=0.252, 100=0.1512, 500=0.1134, 1000=0.09576, 2500=0.09072, 5000=0.08568 (USD)", Radiation Hardening=No, Stock 1=1405667, Supplier 1=Digi-Key, Termination=SMD/SMT, Thickness=0.022inch, Voltage Rating (DC)=16V, Weight=2.3E-05oz, Width=0.02inch
C28: library part 0603B471K500CT, "CAP CER 470PF 50V X7R 0603", Case Code (Imperial)=0603, Case Code (Metric)=1608, Case/Package=Ceramic, Dielectric=X7R, LCSC Part Number=C93192, Manufacturer="Walsin Technologies", Max Operating Temperature=125°C, Min Operating Temperature=-55°C, Tolerance=10%, Voltage Rating=50V, Capacitance=470pF, Category="Ceramic Capacitors", ComponentLink1Description=https://www.verical.com/server-webapp/html/getDatasheet?partID=467798&src-supplier=Verical, ComponentLink1URL=https://www.verical.com/server-webapp/html/getDatasheet?partID=467798&src-supplier=Verical, ComponentLink2Description=http://www.farnell.com/datasheets/2340522.pdf?src-supplier=Farnell, ComponentLink2URL=http://www.farnell.com/datasheets/2340522.pdf?src-supplier=Farnell, ComponentLink3Description=http://www.passivecomponent.com/indexsea/0603B471K500CT-IS.pdf?src-supplier=Digi-Key, ComponentLink3URL=http://www.passivecomponent.com/indexsea/0603B471K500CT-IS.pdf?src-supplier=Digi-Key, ComponentLink4Description=http://www.passivecomponent.com/wp-content/uploads/2018/10/MLCC.pdf?src-supplier=Digi-Key, ComponentLink4URL=http://www.passivecomponent.com/wp-content/uploads/2018/10/MLCC.pdf?src-supplier=Digi-Key, ComponentLink5Description=http://www.farnell.com/datasheets/1958513.pdf?src-supplier=Element14, ComponentLink5URL=http://www.farnell.com/datasheets/1958513.pdf?src-supplier=Element14, ComponentLink6Description=http://www.farnell.com/datasheets/2340522.pdf?src-supplier=Newark, ComponentLink6URL=http://www.farnell.com/datasheets/2340522.pdf?src-supplier=Newark, Depth=0.8mm, Item Type=Capacitor, Lead Free="Lead Free", Length=1.6mm, Manufacturer Part Number=0603B471K500CT, Packaging="Tape and Reel", Pricing 1="4000=0.00550, 8000=0.00460, 12000=0.00440, 40000=0.00430 (USD)", Radiation Hardening=No, REACH SVHC=Unknown, RoHS=Yes, RoHS Compliant=Yes, Stock 1=136000, Supplier 1="Arrow Electronics", Supplier Part Number 1=0603B471K500CT, Voltage Rating (DC)=50V
C33 C35 C36 C38 C39 C53 C58 C59 C63 C64 C65 C66 C67 C68 C69 C70 C71 C75 C79: library part CC0402KRX5R8BB224, "CAP CER 0.22UF 25V X5R 0402", Capacitance=220nF, Case/Package=0402, Dielectric=X5R, LCSC Part Number=C326836, Manufacturer=Yageo, Max Operating Temperature=85°C, Min Operating Temperature=-55°C, Supplier Part Number 1=603-CC402KRX5R8BB224, Tolerance=10%, Voltage Rating=25V, Category="Ceramic Capacitors", ComponentLink1Description=http://www.yageo.com/documents/recent/UPY-GPHC_X5R_4V-to-50V_25.pdf?src-supplier=Digi-Key, ComponentLink1URL=http://www.yageo.com/documents/recent/UPY-GPHC_X5R_4V-to-50V_25.pdf?src-supplier=Digi-Key, ComponentLink2Description=https://www.yageo.com/upload/media/product/productsearch/datasheet/mlcc/UPY-GPHC_X5R_4V-to-50V_26.pdf?src-supplier=Digi-Key, ComponentLink2URL=https://www.yageo.com/upload/media/product/productsearch/datasheet/mlcc/UPY-GPHC_X5R_4V-to-50V_26.pdf?src-supplier=Digi-Key, ComponentLink3Description=http://www.yageo.com/documents/recent/UPY-GPHC_X5R_4V-to-50V_23.pdf?src-supplier=Digi-Key, ComponentLink3URL=http://www.yageo.com/documents/recent/UPY-GPHC_X5R_4V-to-50V_23.pdf?src-supplier=Digi-Key, Halogen Free="Halogen Free", Lead Free="Lead Free", Length=0.039inch, Manufacturer Part Number=CC0402KRX5R8BB224, Mount="Surface Mount", Packaging="Tape and Reel", Pricing 1="1=0.10000, 10=0.03300, 50=0.03300, 100=0.02700, 1000=0.01500, 10000=0.01300 (USD)", RoHS=Yes, RoHS Compliant=Yes, Stock 1=61266, Supplier 1=Mouser, Thickness=0.022inch, Voltage Rating (DC)=25V, Width=0.02inch
C42 C43 C44 C45 C47 C48 C50 C52 C54 C55 C60 C80: library part C1005X7R1H104KT000F, "CAP CER 0.1UF 50V X7R 0402", Dielectric=X7R, LCSC Part Number=C361198, Manufacturer=TDK, Tolerance=10%, Voltage=25V, Category="Ceramic Capacitors", ComponentLink1Description=LCSC, ComponentLink1URL=https://www.lcsc.com/product-detail/Multilayer-Ceramic-Capacitors-MLCC-SMD-SMT_TDK-C1005X7R1H104KT000F_C361198.html, Item Type=Capacitor, Manufacturer Part Number=C1005X7R1H104KT000F, RoHS=No, Supplier 1=Avnet, Supplier Part Number 1=C1005X7R1H104KT000F
C57 C62: library part CC0603MRX5R6BB226, "CAP CER 22UF 10V X5R 0603", Case Code (Imperial)=0603, Case Code (Metric)=1608, Dielectric=X5R, LCSC Part Number=C109447, Manufacturer=Yageo, Max Operating Temperature=85°C, Min Operating Temperature=-55°C, Package Quantity=4000, Supplier Part Number 1=311-1819-1-ND, Tolerance=20%, Voltage Rating=10V, Capacitance=22uF, Case/Package=0603, Category="Ceramic Capacitors", ComponentLink1Description=http://www.mouser.com/ds/2/447/Yageo_UPY-GP_NP0_16V-to-50V_9-358835.pdf?src-supplier=Mouser, ComponentLink1URL=http://www.mouser.com/ds/2/447/Yageo_UPY-GP_NP0_16V-to-50V_9-358835.pdf?src-supplier=Mouser, ComponentLink2Description=http://www.yageo.com/documents/recent/UPY-GPHC_X5R_4V-to-50V_25.pdf?src-supplier=Digi-Key, ComponentLink2URL=http://www.yageo.com/documents/recent/UPY-GPHC_X5R_4V-to-50V_25.pdf?src-supplier=Digi-Key, Halogen Free="Halogen Free", Height=0.8mm, Item Type=Capacitor, Lead Free="Lead Free", Length=0.063inch, Manufacturer Part Number=CC0603MRX5R6BB226, Mount="Surface Mount", Packaging="Tape and Reel", Pricing 1="1=0.68000, 10=0.48000, 50=0.36300, 100=0.31610, 500=0.23416, 1000=0.19903 (USD)", RoHS=Yes, RoHS Compliant=Yes, Stock 1=19628, Supplier 1=Digi-Key, Termination=SMD/SMT, Thickness=0.035inch, Voltage Rating (DC)=10V, Weight=7.1E-05oz, Width=0.8mm
C72 C73 C76 C77: library part GJM1555C1H120GB01D, "CAP CER 12PF 50V C0G/NP0 0402", Case Code (Imperial)=0402, Case Code (Metric)=1005, Dielectric=C0G, LCSC Part Number=C161305, Manufacturer=Murata, Max Operating Temperature=125°C, Min Operating Temperature=-55°C, Package Quantity=10000, Supplier Part Number 1=490-8078-1-ND, Tolerance=2%, Voltage Rating=50V, Capacitance=12pF, Case/Package=0402, Category="Ceramic Capacitors", ComponentLink1Description=https://datasheet.ciiva.com/11608/product-11608208.pdf?src-supplier=Avnet, ComponentLink1URL=https://datasheet.ciiva.com/11608/product-11608208.pdf?src-supplier=Avnet, ComponentLink2Description=https://datasheet.ciiva.com/29542/partnumbering-e-01-29542716.pdf?src-supplier=Digi-Key, ComponentLink2URL=https://datasheet.ciiva.com/29542/partnumbering-e-01-29542716.pdf?src-supplier=Digi-Key, ComponentLink3Description=https://datasheet.ciiva.com/29542/partnumbering-e-01-29542715.pdf?src-supplier=Digi-Key, ComponentLink3URL=https://datasheet.ciiva.com/29542/partnumbering-e-01-29542715.pdf?src-supplier=Digi-Key, ComponentLink4Description=https://datasheet.ciiva.com/29542/partnumbering-e-01-29542717.pdf?src-supplier=Digi-Key, ComponentLink4URL=https://datasheet.ciiva.com/29542/partnumbering-e-01-29542717.pdf?src-supplier=Digi-Key, Construction=Flat, Depth=0.5mm, Height=0.5mm, Lead Free="Lead Free", Length=1mm, Manufacturer Part Number=GJM1555C1H120GB01D, Mount="Surface Mount", Packaging="Tape and Reel", Pricing 1="1=0.18000, 10=0.12600, 50=0.07560, 100=0.06390, 500=0.04370, 1000=0.03865, 2500=0.03698, 5000=0.03361 (USD)", Radiation Hardening=No, RoHS=Yes, RoHS Compliant=Yes, Series=GJM, Stock 1=266975, Supplier 1=Digi-Key, Termination=SMD/SMT, Thickness=0.022inch, Voltage Rating (DC)=50V, Width=0.5mm
C74: library part C3216X5R1A336MTJ00N, "10V 33uF X5R ±20% 1206 ROHS", LCSC Part Number=C342606, Manufacturer=TDK, Package=1206, ComponentLink1Description=https://datasheet.ciiva.com/24216/c3216x5r1a336m160ab-264972-24216176.pdf?src-supplier=Mouser, ComponentLink1URL=https://datasheet.ciiva.com/24216/c3216x5r1a336m160ab-264972-24216176.pdf?src-supplier=Mouser, ComponentLink2Description=https://datasheet.ciiva.com/16482/mlccspec-commercial-general-midvoltage-en-16482550.pdf?src-supplier=Future+Electronics, ComponentLink2URL=https://datasheet.ciiva.com/16482/mlccspec-commercial-general-midvoltage-en-16482550.pdf?src-supplier=Future+Electronics, ComponentLink3Description=https://datasheet.ciiva.com/6253/tdkmlcccaprange-6253132.pdf?src-supplier=Digi-Key, ComponentLink3URL=https://datasheet.ciiva.com/6253/tdkmlcccaprange-6253132.pdf?src-supplier=Digi-Key, ComponentLink4Description=https://datasheet.ciiva.com/6253/tdkmlcccaprange-6253134.pdf?src-supplier=Digi-Key, ComponentLink4URL=https://datasheet.ciiva.com/6253/tdkmlcccaprange-6253134.pdf?src-supplier=Digi-Key, Item Type=Capacitor, Manufacturer Part Number=C3216X5R1A336MTJ00N
D1 D2 D4: "DIODE SCHOTTKY 60V 5A SMA", LCSC Par Number=C65009, Manufacturer=MDD, ComponentLink1Description=LCSC, ComponentLink1URL=https://www.lcsc.com/product-detail/Schottky-Barrier-Diodes-SBD_MDD-Microdiode-Electronics-SS56_C65009.html, Iterm Type=Diode, Manufacturer Part Number=SS56
D3: "40V 3A 550mV@3A SMA(DO-214AC) Schottky Diodes ROHS", LCSC Part Number=C2836396, Manufacturer=MSKSEMI, Package=SMA(DO-214AC), ComponentLink1Description=LCSC, ComponentLink1URL=https://www.lcsc.com/product-detail/Schottky-Diodes_MSKSEMI-SS34-MS_C2836396.html, Item Type=Diode, Manufacturer Part Number=SS34-MS
D5: "DIODE SCHOTTKY 30V 1A SOD123W", LCSC Part Number=C456106, Manufacturer=Nexperia, Supplier Part Number 1=1727-5201-1-ND, Manufacturer Part Number=PMEG3010ER,115, Pricing 1="1=0.35, 10=0.282, 25=0.258, 100=0.162, 250=0.1602, 500=0.15, 1000=0.102 (USD)", Stock 1=72983, Supplier 1=Digi-Key
D6: "TVS DIODE 5VWM 6.3VC DSN0603-2", LCSC Part Number=C477989, Manufacturer=Nexperia, Category="ESD and Circuit Protection ICs", ComponentLink1Description=http://www.farnell.com/datasheets/1961312.pdf?src-supplier=Farnell, ComponentLink1URL=http://www.farnell.com/datasheets/1961312.pdf?src-supplier=Farnell, ComponentLink2Description=https://assets.nexperia.com/documents/data-sheet/PESD5V0H1BSF.pdf?src-supplier=Digi-Key, ComponentLink2URL=https://assets.nexperia.com/documents/data-sheet/PESD5V0H1BSF.pdf?src-supplier=Digi-Key, ComponentLink3Description=http://www.farnell.com/datasheets/1961312.pdf?src-supplier=Newark, ComponentLink3URL=http://www.farnell.com/datasheets/1961312.pdf?src-supplier=Newark, Item Type=Diode, Manufacturer Part Number=PESD5V0H1BSFYL, Pricing 1="18000=0.06453, 36000=0.06278, 54000=0.06104, 90000=0.05930, 180000=0.05755, 900000=0.05581, 1800000=0.05406 (USD)", RoHS=Yes, RoHS Compliant=Yes, Stock 1=9000, Supplier 1=Avnet, Supplier Part Number 1=PESD5V0H1BSFYL
D7: "16A 20V 7V 5V@Max Unidirectional SOT-23 TVS ROHS", LCSC Part Number=C239643, Manufacturer=WILLSEMI, Package=SOT-23, ComponentLink1Description=LCSC, ComponentLink1URL=https://www.lcsc.com/product-detail/TVS_WILLSEMI-Will-Semicon-ESD5302F-3-TR_C239643.html, Item Type=Diode, Manufacturer Part Number=ESD5302F-3/TR